# Altium PCB LSS-P-PCB-T v3.5.PcbDoc (part 1 of 5)
Units mil, origin at the board's own origin, x right, y up, seen from the top; angles counter-clockwise.
Board outline 2795.28 x 2795.28 mil, 4 copper layers (Top Layer, Power, Ground, Bottom Layer), stack 62.08 mil thick; 167 components, 123 nets, 589 pads, 650 vias.
Unrouted connection lines stored in the file: 2.
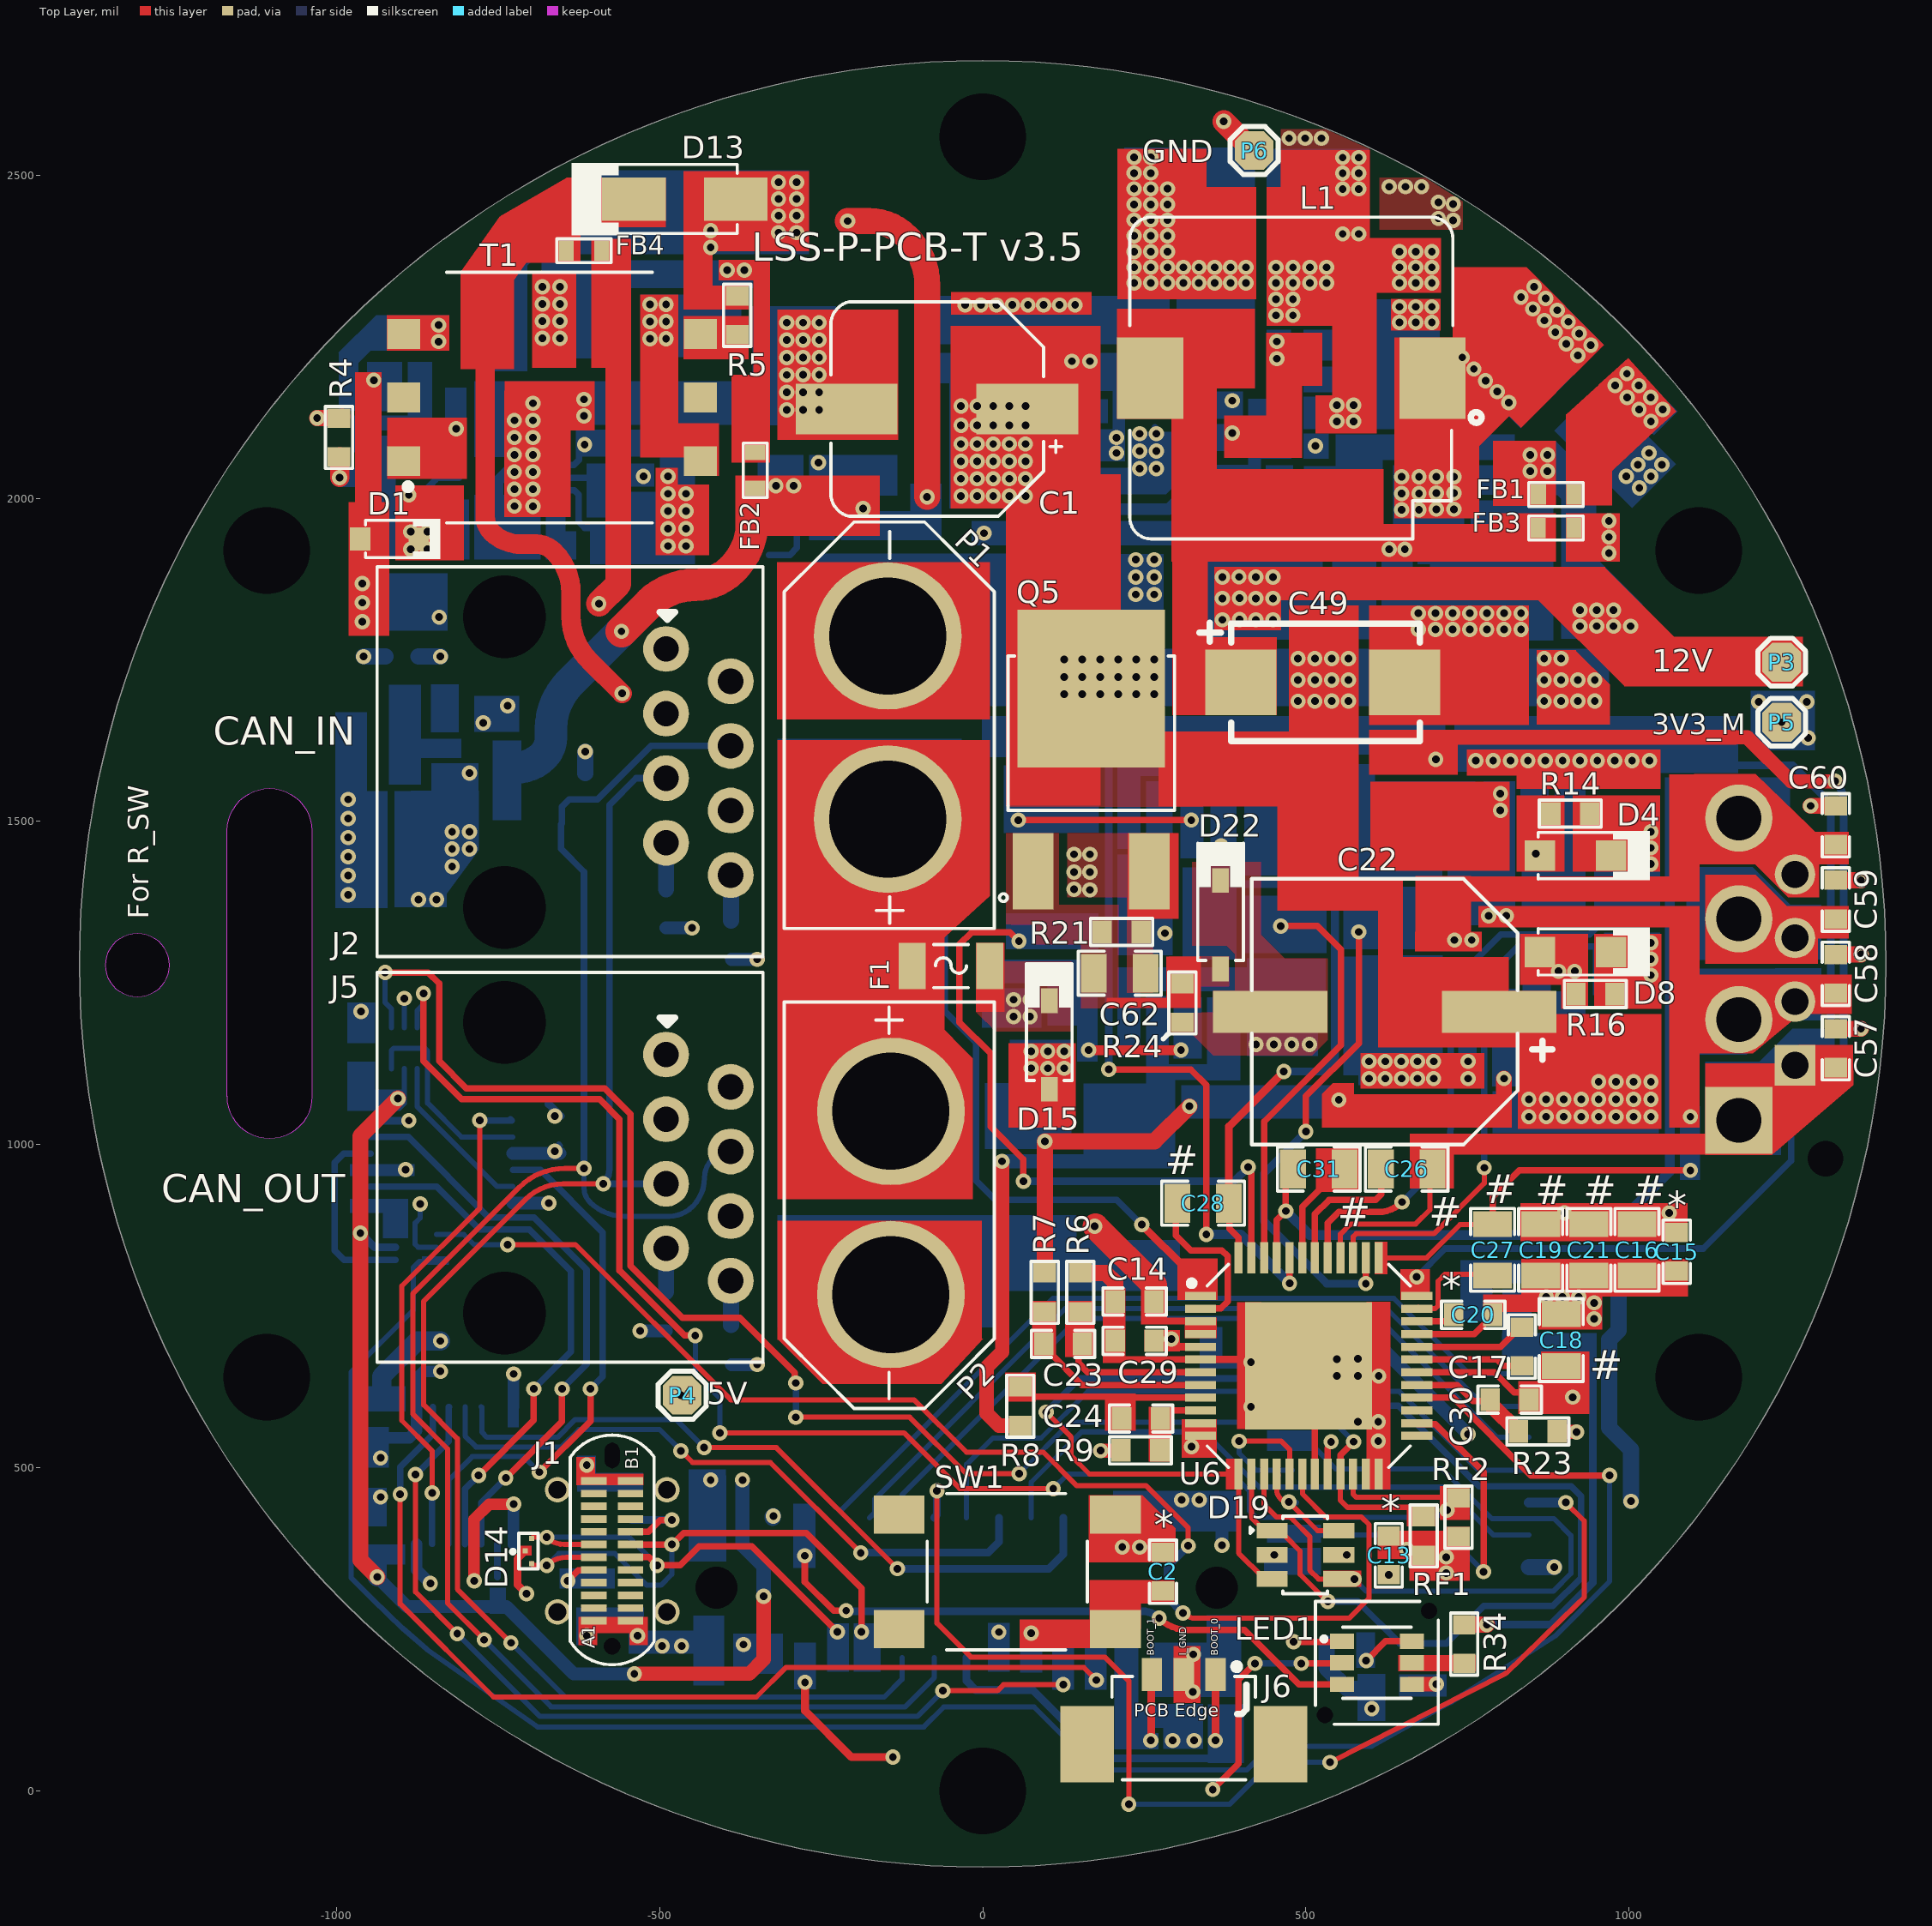
[diagram p0: Top Layer view]
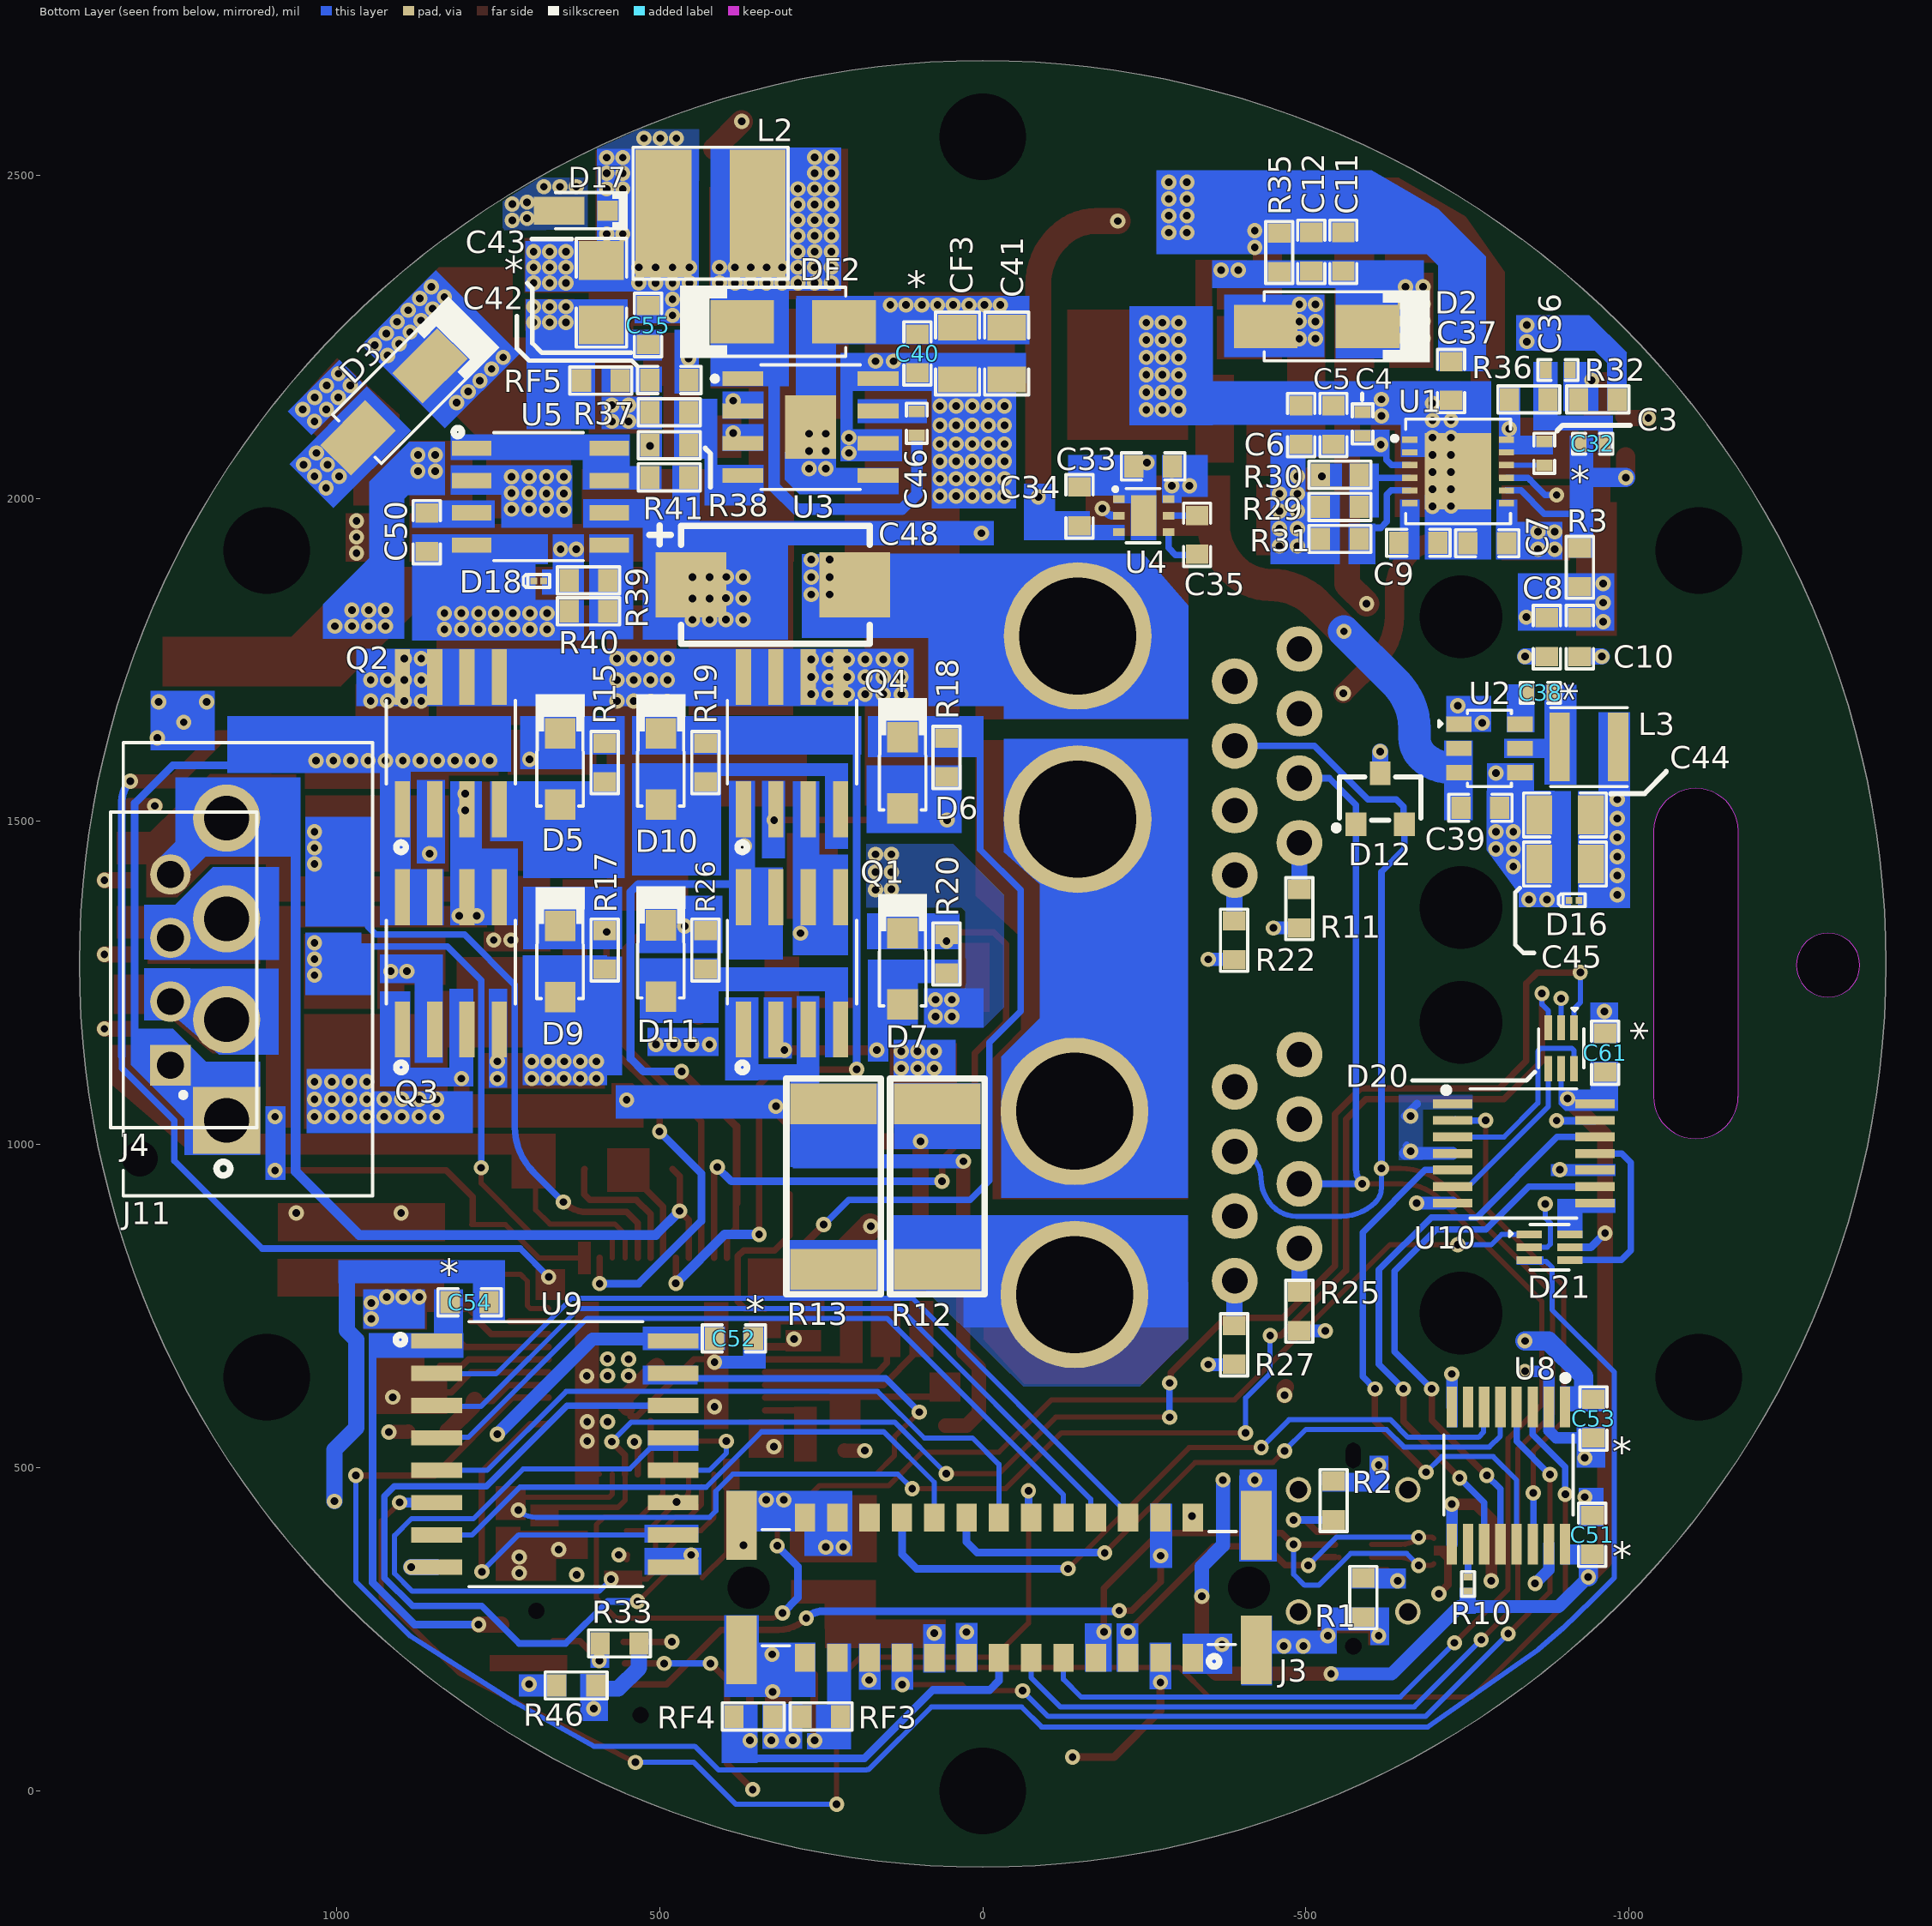
[diagram p1: Bottom Layer view, seen from below]
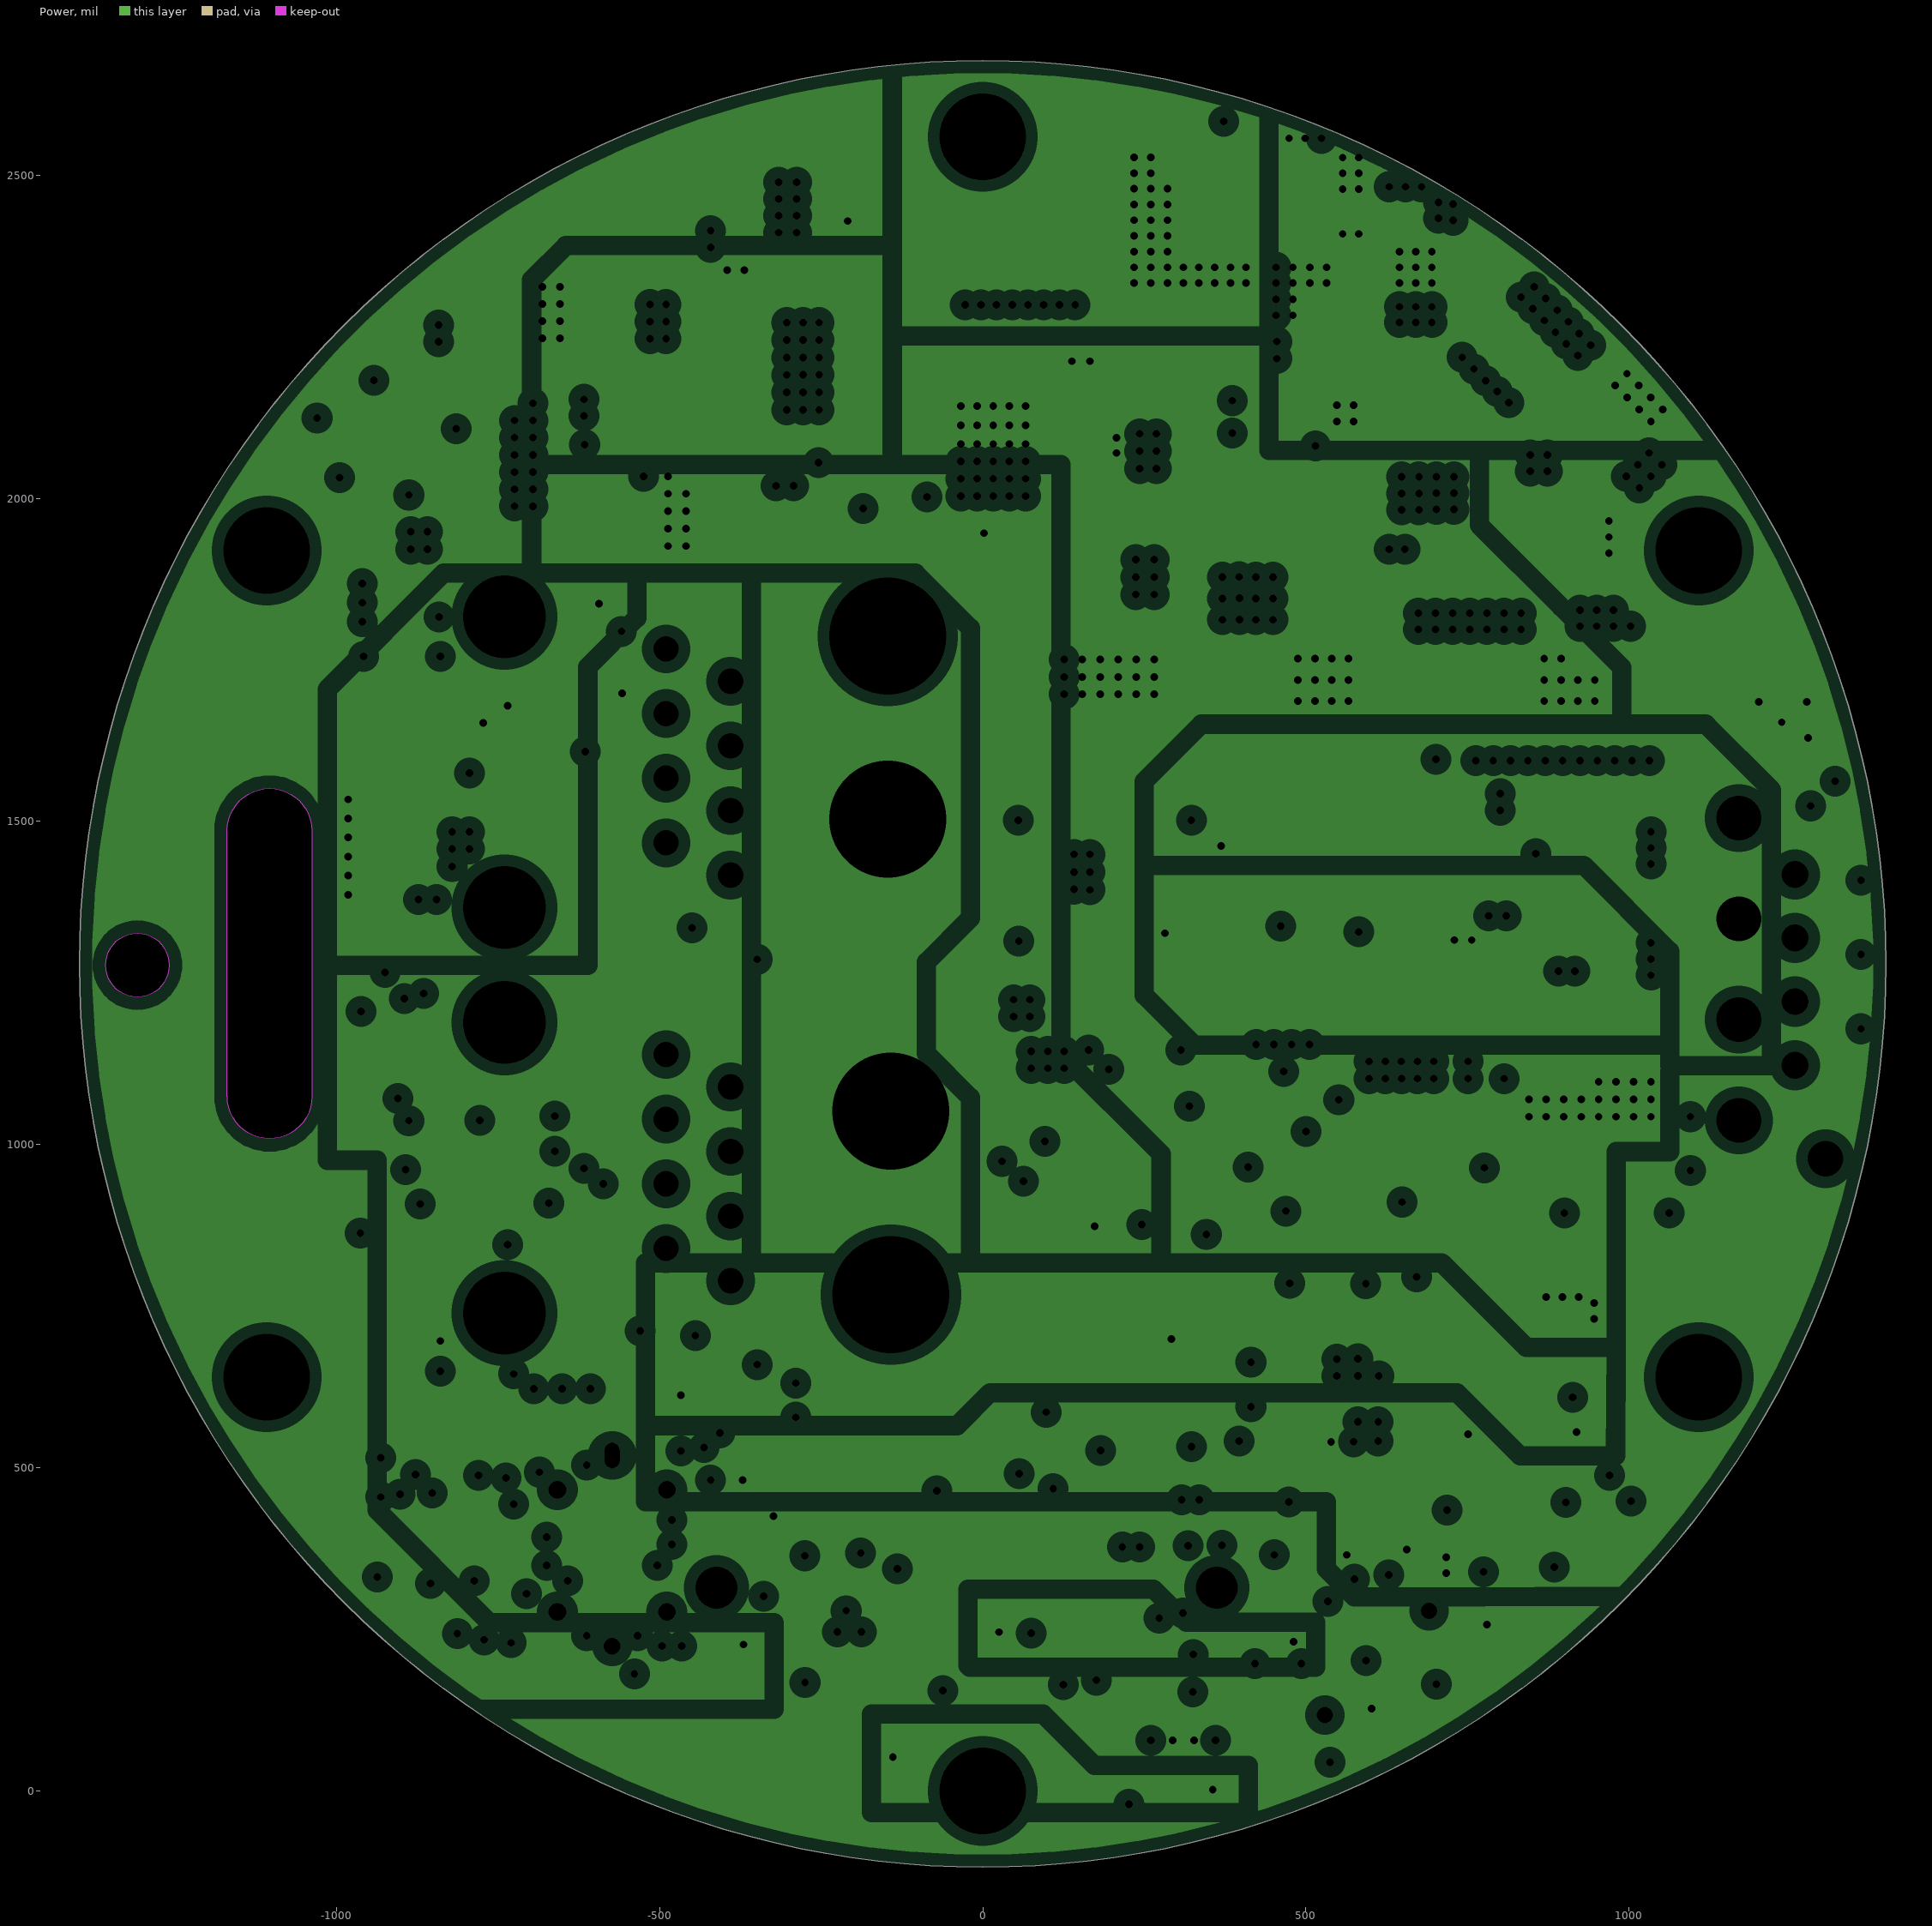
[diagram p2: Power, clearances drawn from the general rule]
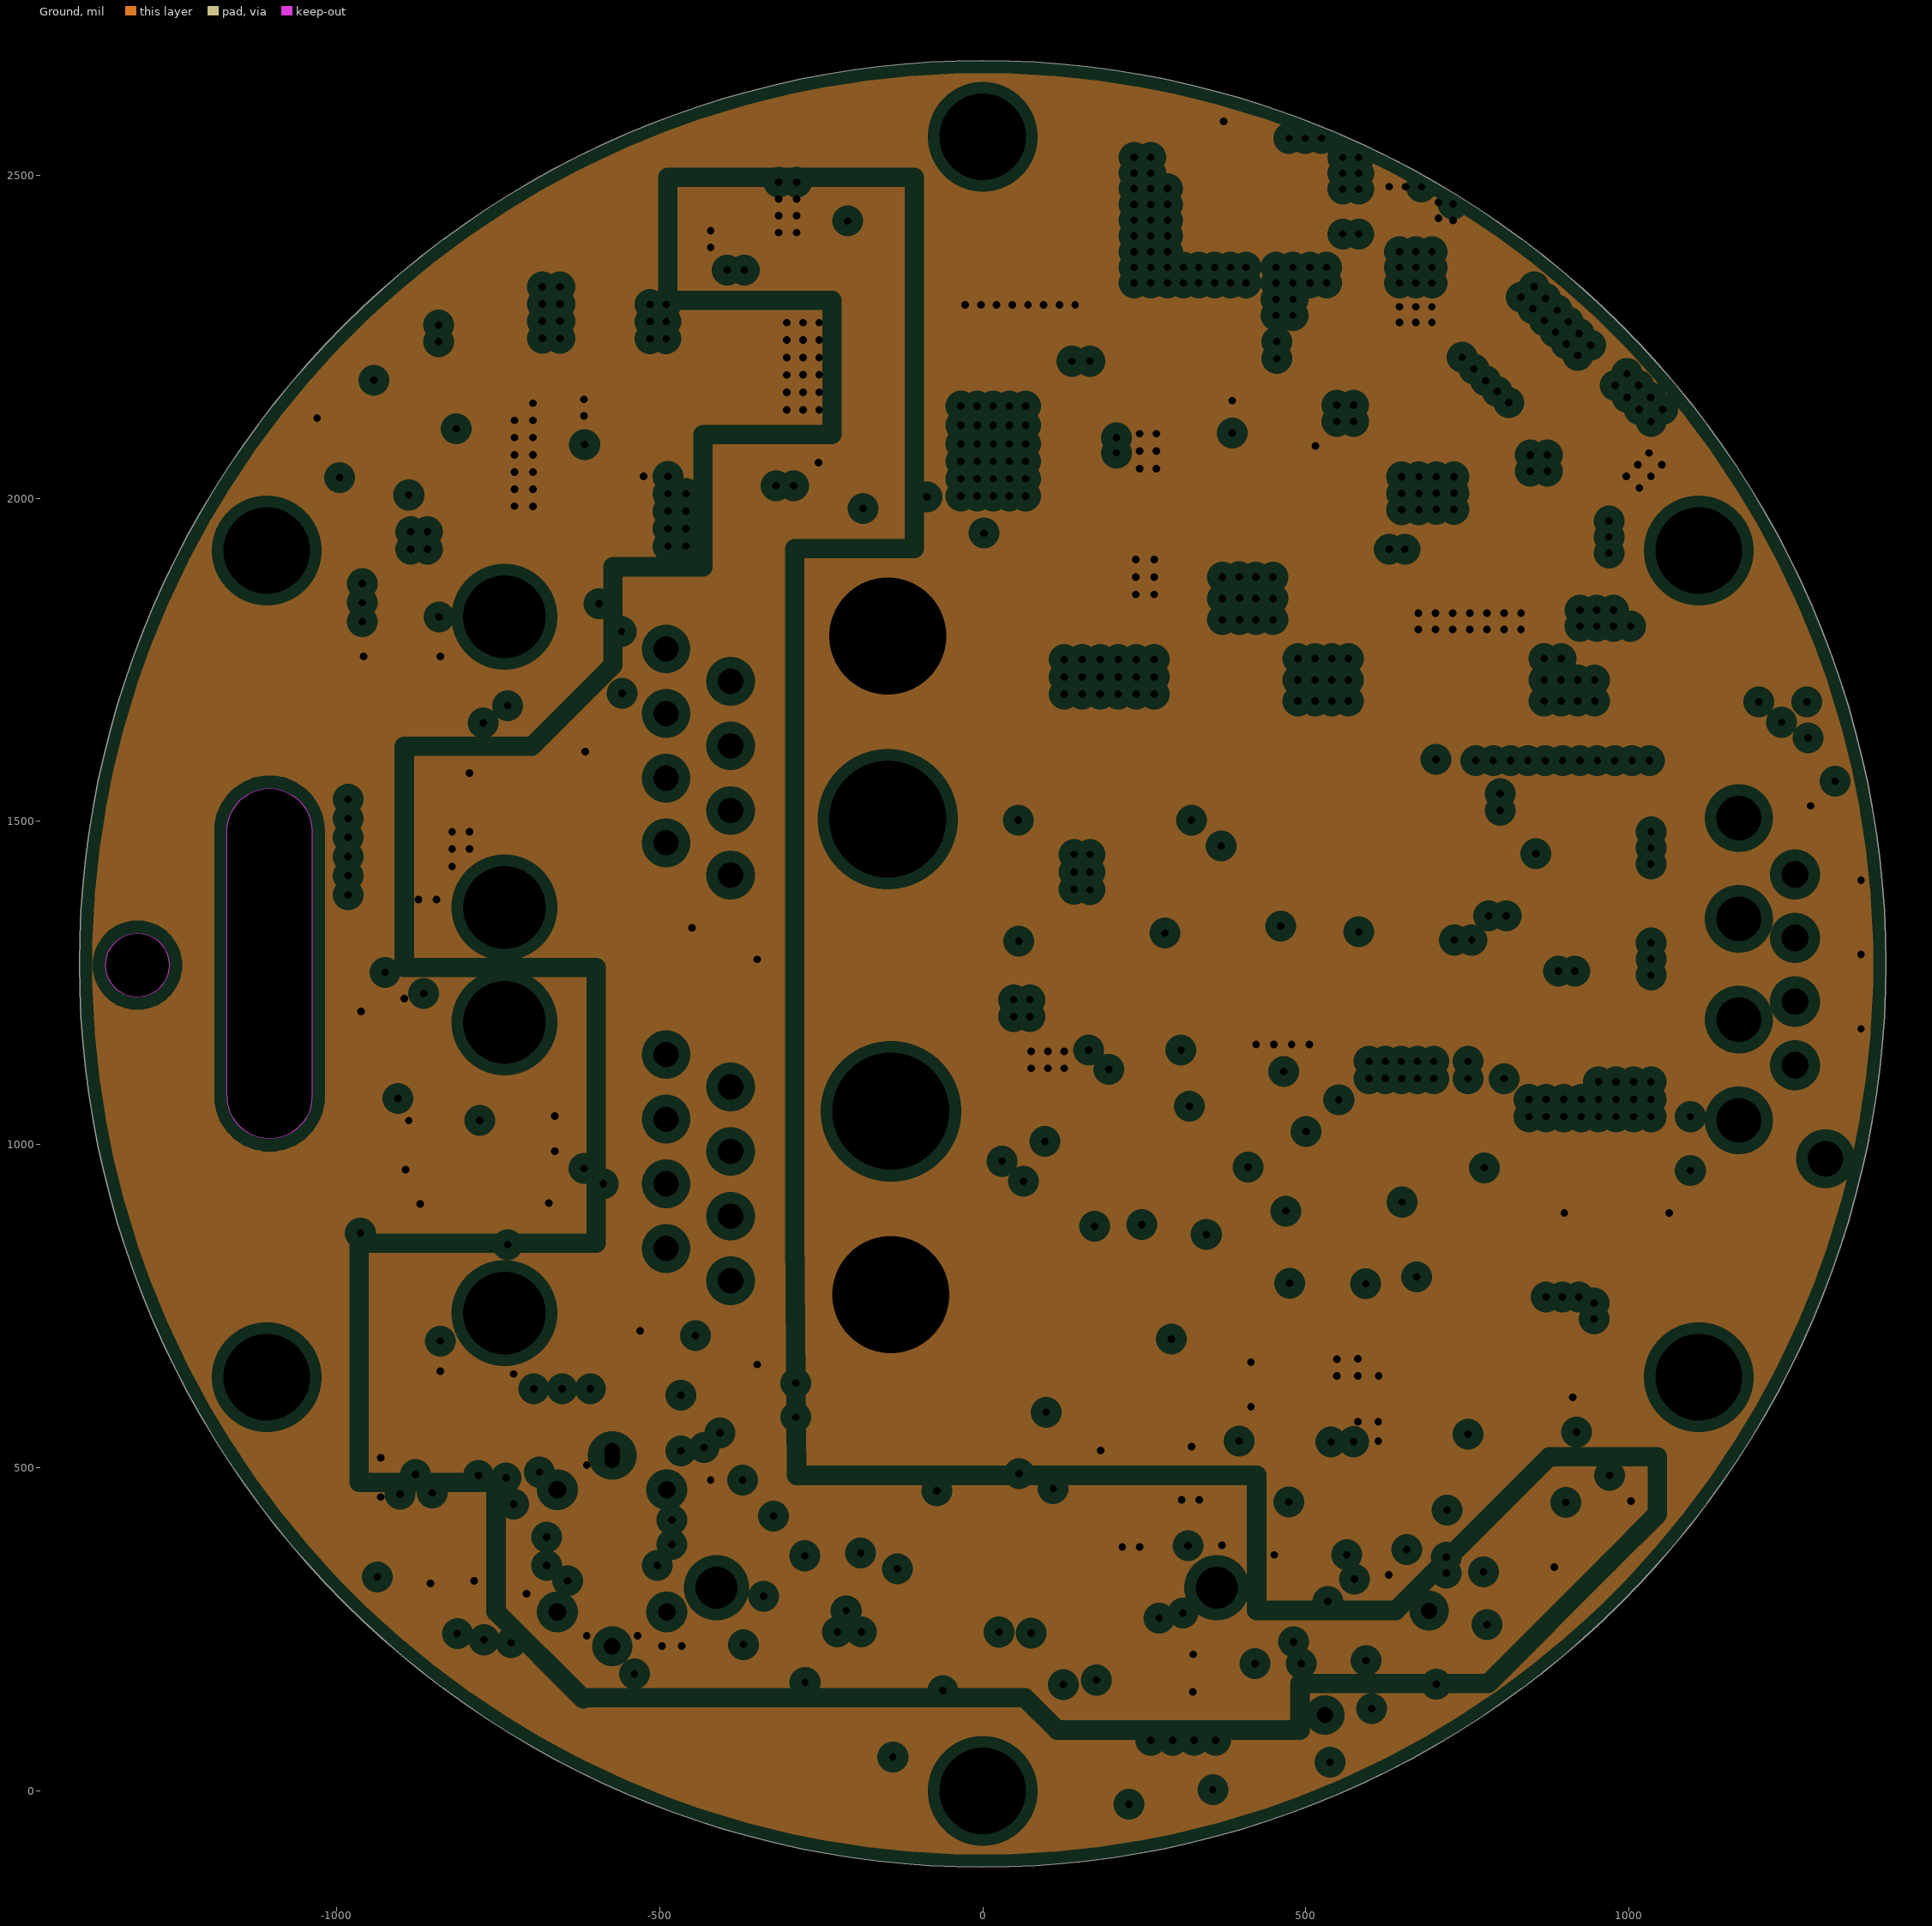
[diagram p3: Ground, clearances drawn from the general rule]
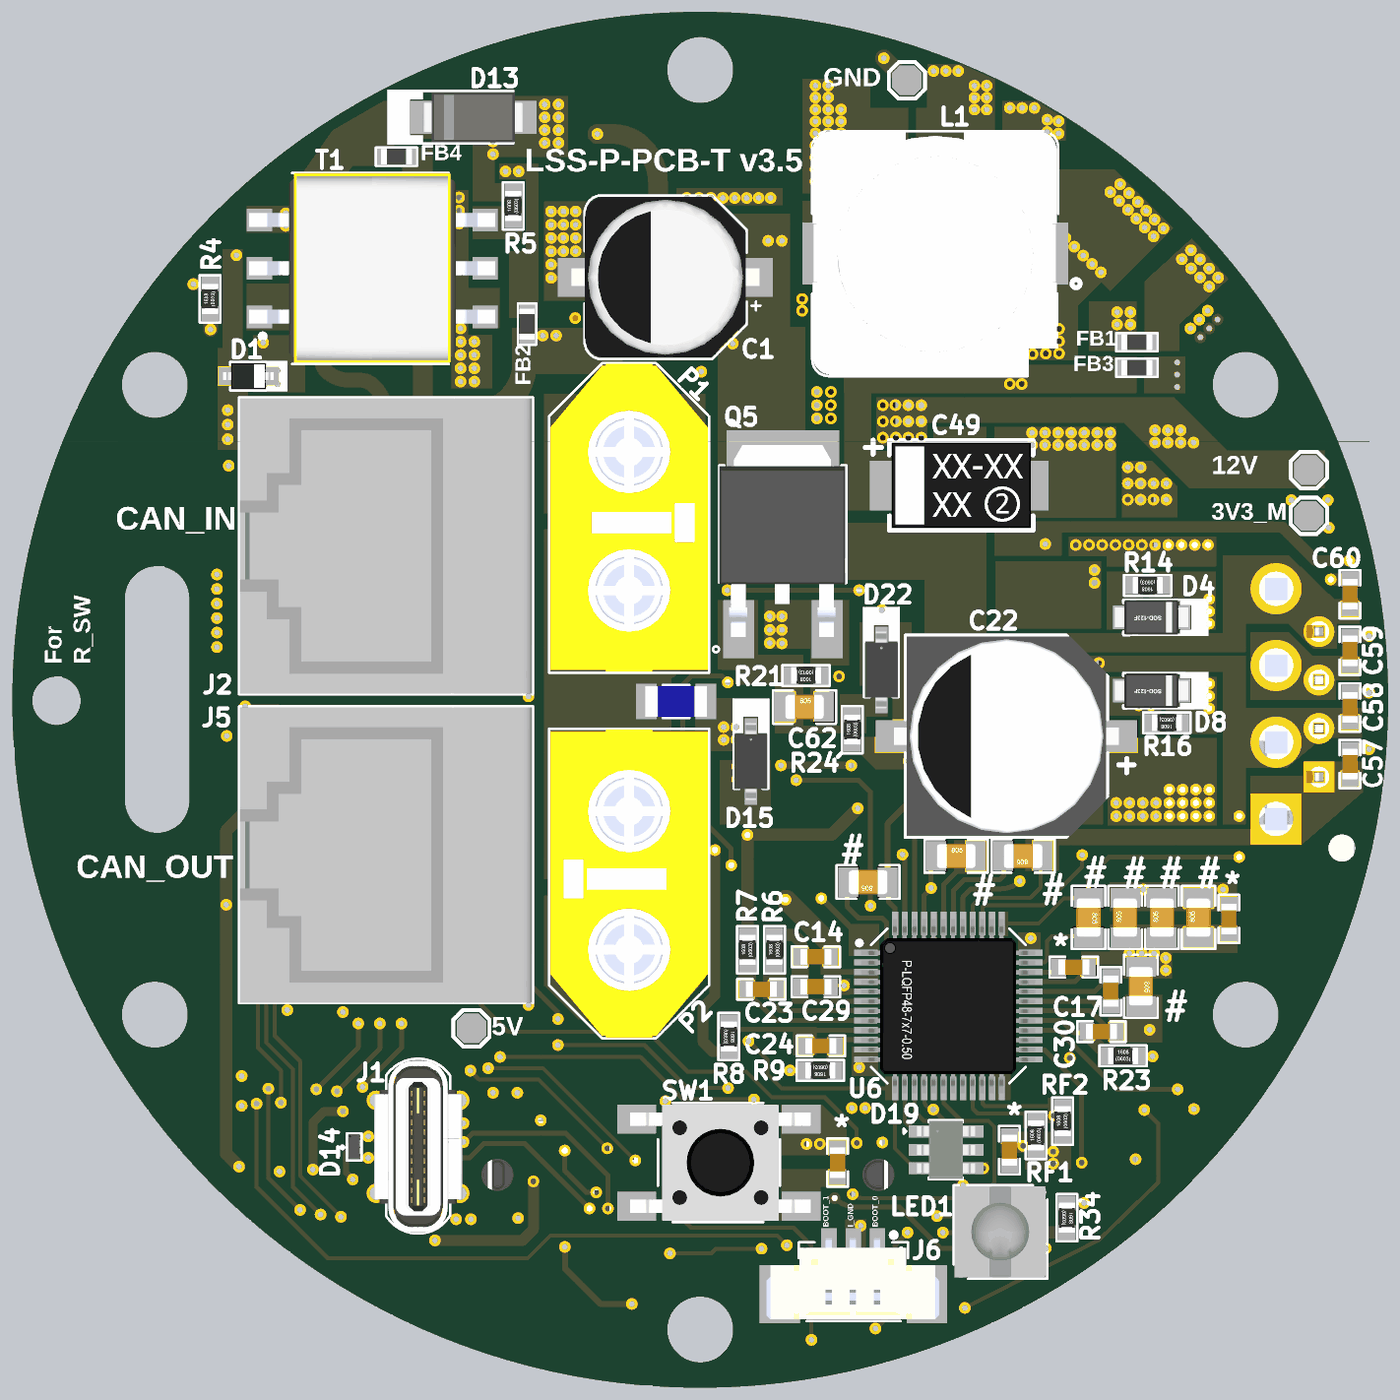
[diagram p6: 3D render of the assembled board from above, using the file's embedded part models]
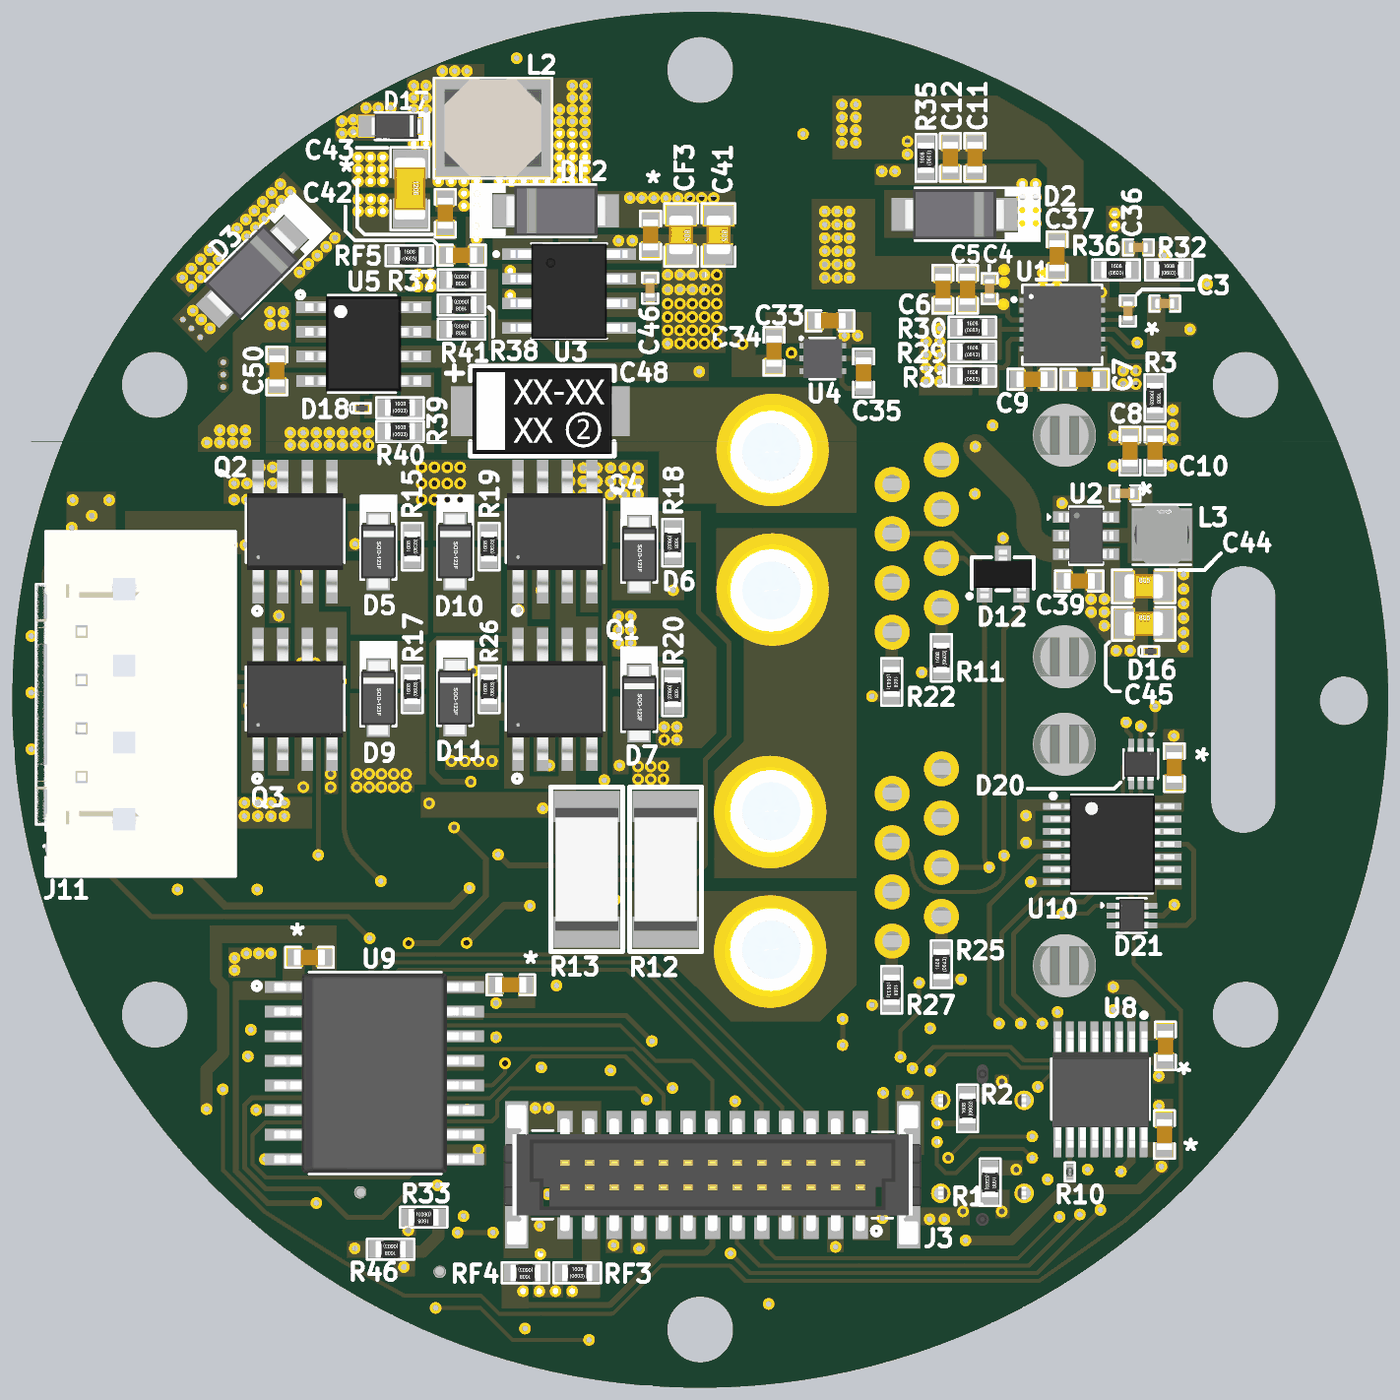
[diagram p7: 3D render of the assembled board from below, using the file's embedded part models]

## Layer stack, top to bottom
Top Solder: solder mask 0.5, Solder Resist, Dk 3.5
Top Layer: signal copper 1.7
Prepreg 1: prepreg 5, PP-015, Dk 4.3
Power: plane copper 1.7, net (Multiple Nets)
Core: core 45.28, FR-4, Dk 4.8
Ground: plane copper 1.7, net (Multiple Nets)
Prepreg 2: prepreg 5, PP-015, Dk 4.3
Bottom Layer: signal copper 1.7
Bottom Solder: solder mask 0.5, Solder Resist, Dk 3.5

## Board outline
-1397.64,1279.53 ccw(c0,1279.53) 0,-118.11 ccw(c0,1279.53) 1397.64,1279.53 ccw(c0,1279.53) 0,2677.17 ccw(c0,1279.53)
cut-out: -1308,1228.32 cw(c-1308,1277.53) -1357.21,1277.53 cw(c-1308,1277.53) -1308,1326.74 cw(c-1308,1277.53) -1258.79,1277.53 cw(c-1308,1277.53)
cut-out: -1169,1074.52 -1169,1485.52 -1169.09,1485.52 cw(c-1103.59,1485.52) -1038.09,1485.53 -1038,1485.53 -1038,1074.52 -1037.93,1074.52 cw(c-1103.43,1074.52)

## Design rules (kind name [scope] priority, off if disabled: settings)
Clearance [All] p1: gap=7 ignorepadtopadclearanceinfootprint=FALSE except(0: Arc-Hole Track-Hole SMDPad-Hole THPad-Hole Via-Hole Fill-Hole Poly-Hole Region-Hole Text-Hole; 5: Arc-SMDPad Track-SMDPad SMDPad-SMDPad)
ComponentClearance [All] p1: gap=7 collisioncheckmode=3 verticalgap=7 showdistances=FALSE
HoleSize [All] p1: absolutevalues=TRUE maxlimit=1000 minlimit=1 maxpercent=80.000 minpercent=20.000
HoleToHoleClearance [All] p1: gap=0 allowstackedmicrovias=TRUE
MinimumSolderMaskSliver [All] p1: minsoldermaskwidth=0
PlaneClearance [All] p1: clearance=18
PlaneConnect [All] p1: planeconnectstyle=Direct reliefexpansion=20 reliefentries=4 reliefconductorwidth=10 reliefairgap=10
PolygonConnect [All] p1: connectstyle=Direct reliefconductorwidth=10 reliefentries=4 polygonreliefangle="90 Angle" airgapwidth=10
RoutingVias [All] p1: holewidth=11.81 width=23.62 viastyle="Through Hole" minholewidth=11.81 minwidth=23.62 maxholewidth=11.81 maxwidth=23.62
SilkToSilkClearance [All] p1: silktosilkclearance=0
SilkToSolderMaskClearance [IsPad] p1: minsilkscreentomaskgap=0 clearancetoexposedcopper=TRUE
SolderMaskExpansion SolderMaskExpansion_1 [Not IsVia] p1: expansion=4 istentingtop=FALSE
SolderMaskExpansion [IsVia] p2: expansion=0 istentingtop=FALSE soldermaskfromhole=TRUE
UnRoutedNet [All] p1: checkbadconnections=TRUE
Width [All] p1: maxlimit=100 minlimit=8 preferedwidth=22 minimp=50.000000 maximp=50.000000 favimp=50.000000
21 further rules are at their usual default settings.

## Classes and differential pairs
component class Signal-Isolation-Section: C51 C52 C53 C54 C61 D19 D20 D21 R10 U8 U9 U10
component class Motor-Supply-Section: C40 C41 C42 C43 C46 C48 C49 C50 C55 CF3 D3 D17 D18 DF2 FB1 FB3 L1 L2 R37 R38 R39 R40 R41 RF5 s U3 U5
component class Motor-Driver-Sheet: C13 C14 C15 C16 C17 C18 C19 C20 C21 C22 C23 C24 C26 C27 C28 C29 C30 C31 J4 J11 P3 P4 P5 P6 R6 R7 R8 R9 R12 R13 R23 RF1 RF2 U6
component class Isolated-Power-Section: 12 C3 C4 C5 C6 C7 C8 C9 C10 C11 C12 C32 C33 C34 C35 C36 C37 C38 C39 C44 C45 D1 D2 D13 D16 FB2 FB4 L3 R3 R4 R5 R29 R30 R31 R32 R35 R36 T1 U1 U2 U4
component class Driver-Sheet: C57 C58 C59 C60 D4 D5 D6 D7 D8 D9 D10 D11 Q1 Q2 Q3 Q4 R14 R15 R16 R17 R18 R19 R20 R26
component class Connector-Section: C1 C2 C62 D12 D14 D15 D22 F1 J1 J2 J3 J5 J6 LED1 P1 P2 Q5 R1 R2 R11 R21 R22 R24 R25 R27 R33 R34 R46 RF3 RF4 SSz SW1

## Components (designator, comment, footprint, x,y, rotation, side; value= is the part's Value field where it differs from the comment)
C1 "220uF" EEEFT1H221AP -70.76,2138 r180 top locked
C2 "0.1uF" "CAP 0603"#1 279,339 r270 top locked
C3 "10nF" "CAP 0402" -869,2069.5 r90 bottom locked
C4 "0.47uF" "CAP 0402" -587.71,2114.87 r90 bottom locked
C5 "2.2uF" "CAP 0603"#1 -542.71,2113.37 r90 bottom locked
C6 "2.2uF" "CAP 0603"#1 -492.71,2113.37 r90 bottom locked
C7 "1uF" "CAP 0603"#1 -780.71,1930.37 r0 bottom locked
C8 "10uF" "CAP 0603"#1 -873,1785 r270 bottom locked
C9 "82nF" "CAP 0603"#1 -674,1931 r0 bottom locked
C10 "10uF" "CAP 0603"#1 -924,1785 r270 bottom locked
C11 "10uF" "CAP 0603"#1 -558,2381.37 r90 bottom locked
C12 "10uF" "CAP 0603"#1 -508.36,2381.37 r90 bottom locked
C13 "0.1uF" "CAP 0603"#1 628.29,364.37 r270 top locked
C14 "2.2uF" "CAP 0603"#1 235,757 r180 top locked
C15 "0.1uF" "CAP 0603"#1 1074,834 r90 top locked
C16 "220nF" CAP0805#1 1012.28,837 r90 top locked
C17 "22nF" "CAP 0603"#2 834.29,687.37 r90 top locked
C18 "220nF" CAP0805#2 895.29,697.37 r270 top locked
C19 "220nF" CAP0805#2 863.43,837 r90 top locked
C20 "0.1uF" "CAP 0603"#1 758.96,736.27 r0 top locked
C21 "220nF" CAP0805#2 937.86,837 r90 top locked
C22 "220uF" 189RV0038 622.13,1205.37 r180 top locked
C23 "2.2nF" Cap-0603 124.29,691.37 r0 top locked
C24 "2.2nF" Cap-0603 245,576 r0 top locked
C26 "220nF" CAP0805#1 656,962 r180 top locked
C27 "220nF" CAP0805#1 789,837 r270 top locked
C28 "220nF" CAP0805#1 341,909.03 r180 top locked
C29 "2.2uF" "CAP 0603"#2 235,696.3 r180 top locked
C30 "0.47uF" "CAP 0603"#1 815.29,605.37 r0 top locked
C31 "220nF" CAP0805#1 520,962 r0 top locked
C32 "0.1UF" "CAP 0402" -943.71,2084.37 r0 bottom locked
C33 "4.7UF" "CAP 0603"#1 -263.71,2049.37 r0 bottom locked
C34 "2.2uF" "CAP 0603"#1 -149.71,1987.37 r90 bottom locked
C35 "2.2uF" "CAP 0603"#1 -331.71,1943.37 r270 bottom locked
C36 "1000pF" "CAP 0402" -890.21,2198.37 r180 bottom locked
C37 "2.2nF" "CAP 0603"#1 -724.71,2181.37 r90 bottom locked
C38 "0.1uf" Cap-0402 -863,1699 r0 bottom locked
C39 "10uF" Cap-0603 -770,1521 r0 bottom locked
C40 "0.1uF" "CAP 0603"#1 101,2224 r90 bottom locked
C41 "10uF" Cap0805 -37,2224 r270 bottom locked
C42 "6.8nF" "CAP 0603"#1 485,2183 r0 bottom locked
C43 "47uF" CAP1206 590,2318 r270 bottom locked
C44 "22uF" Cap-0805 -901,1510 r180 bottom locked
C45 "22uF" Cap-0805 -901,1434 r180 bottom locked
C46 "10nF" "CAP 0402" 102,2116 r270 bottom locked
C48 "100uF" "CAP- 2917" 451.54,1866 r180 bottom locked
C49 "100uF" "CAP- 2917" 399.45,1715.01 r0 top locked
C50 "470pF" "CAP 0603"#1 860.29,1947.37 r90 bottom locked
C51 "0.1uF" "CAP 0603"#1 -943,396 r90 bottom locked
C52 "0.1uF" "CAP 0603"#1 385,700 r180 bottom locked
C53 "0.1uF" "CAP 0603"#1 -945,576 r270 bottom locked
C54 "0.1uF" "CAP 0603"#1 794,756 r180 bottom locked
C55 "0.1uF" "CAP 0603"#1 518,2268 r270 bottom locked
C57 "1nF" "CAP 0603"#1 1320,1149 r90 top locked
C58 "1nF" "CAP 0603"#1 1320,1264 r90 top locked
C59 "1nF" "CAP 0603"#1 1320,1379 r90 top locked
C60 "1nF" "CAP 0603"#1 1320,1494 r90 top locked
C61 "0.1uF" "CAP 0603"#1 -963,1142 r90 bottom locked
C62 "10uF" Cap0805 212,1265 r0 top locked
CF3 "10uF" Cap0805 39,2224 r270 bottom locked
D1 "CUS10S30,H3F" CUS10S30,H3F -918,1937 r180 top locked
D2 "SSL110A" SMA -516.74,2266 r0 bottom locked
D3 "SS24A" SMA 911,2149 r315 bottom locked
D4 "CRS01(TE85L,Q,M)" CRS01(TE85L,Q,M) 917.02,1447 r180 top locked
D5 "CRS01(TE85L,Q,M)" CRS01(TE85L,Q,M) 654,1580.98 r270 bottom locked
D6 "CRS01(TE85L,Q,M)" CRS01(TE85L,Q,M) 124,1575.01 r270 bottom locked
D7 "CRS01(TE85L,Q,M)" CRS01(TE85L,Q,M) 124.03,1272 r270 bottom locked
D8 "CRS01(TE85L,Q,M)" CRS01(TE85L,Q,M) 917.02,1298 r180 top locked
D9 "CRS01(TE85L,Q,M)" CRS01(TE85L,Q,M) 653.98,1283 r270 bottom locked
D10 "CRS01(TE85L,Q,M)" CRS01(TE85L,Q,M) 498,1581 r270 bottom locked
D11 "CRS01(TE85L,Q,M)" CRS01(TE85L,Q,M) 498,1284.12 r270 bottom locked
D12 "PESD2CAN,215" SOT-23 -615,1535 r180 bottom locked
D13 "1SMA5913BT3G-MS" SMA -461,2463 r0 top locked
D14 "ESD122DMYR" X2-SON-3(0.6x1.3) -703,371 r0 top locked
D15 "AZ4036-01G" SOD-123 103,1154 r270 top locked
D16 "ESDM2033MX4T5G" "2-DFN (0.6x0.3)" -915,1378 r180 bottom locked
D17 "MSMP12A-M3/89A" MicroSMP 618,2445 r180 bottom locked
D18 "ESDM2033MX4T5G" "2-DFN (0.6x0.3)" 687,1872 r180 bottom locked
D19 "USBLC6-4SC6" SOT-23-6 499.53,365 r0 top locked value=4pF
D20 "USBLC6-2P6" SOT-666 -895,1149 r270 bottom locked value=3.5pF
D21 "USBLC6-2P6" SOT-666 -877,841 r180 bottom locked value=3.5pF
D22 "BZT52C16" SOD-123 368,1340 r270 top locked
DF2 "SS24A" SMA 293.26,2273 r180 bottom locked
F1 "0685P9100-01" "Fuse 1206 (3216 Metric)" -49,1276 r180 top locked
FB1 "MPZ1608S121ATDH5" MPZ1608S121ATDH5 887.26,2006 r180 top locked
FB2 "MPZ1608S121ATDH5" MPZ1608S121ATDH5 -352,2043 r270 top locked
FB3 "MPZ1608S121ATDH5" MPZ1608S121ATDH5 887,1954 r0 top locked
FB4 "MPZ1608S121ATDH5" MPZ1608S121ATDH5 -617,2383 r180 top locked
J1 "MC-318FB" MC-318FB -573.34,371.27 r90 top locked
J2 "0855115001" 0855115001 -565,1591.8 r270 top locked
J3 "M55-7012642R" M55-7012642R -25,314.26 r180 bottom locked
J4 "B4B-XH-A(LF)(SN)" B4B-XH-A(LF)(SN) 1257,1122.72 r90 bottom locked
J5 "0855115001" 0855115001 -565,964.19 r270 top locked
J6 "0533980367" 0533980367 311,126 r180 top locked
J11 "B4P-VH-FB-B(LF)(SN)" B4P-VH-FB-B(LF)(SN) 1236.93,1241.65 r90 bottom locked
L1 "220uH" SLF12575T-221M1R3-PF 477.5,2186 r180 top locked
L2 "33uH" PNLS5020-330 421.17,2441 r180 bottom locked
L3 "3.9uH" FNR3015S3R9MT -938,1615 r180 bottom locked
LED1 "LTST-G683GEBW" LTST-G683GEBW 610,198 r0 top locked
P1 "2158" 2158 -147,1645.2 r270 top locked
P2 "2158" 2158 -142,909.62 r90 top locked
P3 "Test Point" "TEST POINT" 1236.29,1746.37 r180 top locked
P4 "Test Point" "TEST POINT" -465,612 r270 top locked
P5 "Test Point" "TEST POINT" 1236.29,1653.37 r0 top locked
P6 "Test Point" "TEST POINT" 420,2538 r90 top locked
Q1 "AO4882-MS" AO4882-MS 295,1280.36 r90 bottom locked
Q2 "AO4882-MS" AO4882-MS 823,1621 r90 bottom locked
Q3 "AO4882-MS" AO4882-MS 823,1280.36 r90 bottom locked
Q4 "AO4882-MS" AO4882-MS 295,1621 r90 bottom locked
Q5 "SQD19P06-60L_GE3" DPAK 168,1564 r0 top locked
R1 "5.1K" RES0603 -589,299 r90 bottom locked
R2 "5.1K" RES0603 -543,449 r270 bottom locked
R3 "3.9K" RES0603 -924,1893 r90 bottom locked
R4 "7.87k" RES0603 -996,2094 r270 top locked
R5 "0R" RES0603 -380,2283 r270 top locked
R6 "47R" RES0603 150.96,771.27 r270 top locked
R7 "47R" RES0603 95.96,771.27 r270 top locked
R8 "47R" RES0603 58,595 r90 top locked
R9 "47R" RES0603 244,526.63 r0 top locked
R10 "4.7K" Res-0201 -751,320 r90 bottom locked
R11 "0R" Res0603 -490,1365 r270 bottom locked
R12 "50mR" RES-2512 70.28,935 r270 bottom locked
R13 "50mR" RES-2512 230.86,935 r270 bottom locked
R14 "22R" RES0603 909,1512 r0 top locked
R15 "22R" RES0603 585,1591 r270 bottom locked
R16 "22R" RES0603 948,1233 r0 top locked
R17 "22R" RES0603 585,1301 r270 bottom locked
R18 "22R" RES0603 56,1599 r90 bottom locked
R19 "22R" RES0603 429,1591 r270 bottom locked
R20 "22R" RES0603 56,1295 r90 bottom locked
R21 "24.9K" Res0603 215,1329 r0 top locked
R22 "0R" Res0603 -389,1316 r90 bottom locked
R23 "2R2" RES0603 859,556 r180 top locked
R24 "20K" Res0603 309,1219 r270 top locked value=20kR
R25 "0R" Res0603 -490,742 r270 bottom locked
R26 "22R" RES0603 429,1301 r270 bottom locked
R27 "0R" Res0603 -389,690 r90 bottom locked
R29 "127K" RES0603 -552.71,1986.69 r0 bottom locked
R30 "100K" RES0603 -552.71,2036.37 r0 bottom locked
R31 "100K" RES0603 -552.71,1937 r0 bottom locked
R32 "0R" RES0603 -951.71,2153 r0 bottom locked
R33 "51R" RES0603 562,228 r180 bottom locked
R34 "150R" RES0603 745,227 r90 top locked
R35 "2K" RES0603 -458.71,2380.37 r270 bottom locked
R36 "51.1K" RES0603 -845,2153 r0 bottom locked
R37 "110K" RES0603 485,2133 r180 bottom locked
R38 "10K" RES0603 485,2082 r180 bottom locked
R39 "2K" RES0603 610,1873 r0 bottom locked
R40 "1.2K" RES0603 610,1825 r0 bottom locked value=1.2kΩ
R41 "0.33R" RES0603 485,2032.37 r180 bottom locked value=0.33Ω
R46 "51R" RES0603 629,163 r180 bottom locked
RF1 "10K" RES0603 682.29,394.37 r270 top locked
RF2 "10K" RES0603 736.29,423.37 r270 top locked
RF3 "10K" RES0603 250,115 r0 bottom locked
RF4 "10K" RES0603 355,115 r180 bottom locked
RF5 "10K" RES0603 591,2182 r0 bottom locked
SW1 "Tactile Switch 13mm Actuator" "TACTILE SWITCH 13MM ACTUATOR" 38,339 r180 top locked
T1 "750314597" 750314597 -666.19,2155.8 r180 top locked
U1 "LM5160ADNTR" LM5160ADNTR -735.52,2041.53 r180 bottom locked
U2 "AP63203WU-7" TSOT-23-6 -784,1613 r180 bottom locked
U3 "BD9876AEFJ-E2" 8-HTSOP-J 266.53,2110 r180 bottom locked
U4 "TPS60150DRVR" TPS60150DRVR -249.1,1972.96 r180 bottom locked
U5 "MC34063ADR" SOIC-8 684.29,2002.37 r180 bottom locked
U6 "TMC5160A-TA-T" "48-TQFP-EP (7X7)" 504.29,657.37 r0 top locked
U8 "ISO7740FDBQR" 16-SSOP -901,594 r270 bottom locked
U9 "ISO6762FQDWRQ1" 16-SOIC 662,521 r180 bottom locked
U10 "SN74LVTH125PWR" SN74LVTH125PWR -837.17,986.15 r180 bottom locked

## Footprints (in the part's own frame and the unit in brackets; to place one, negate y for a bottom-side part, rotate by r counter-clockwise, add the part's x,y. Pads: shape width x height; smd on the part's side, far side on the other; paste and mask are expansions set on the pad)
"2-DFN (0.6x0.3)" [mm]
  rect 0.26x0.27 smd mask+0.055: 1(-0.195,0) 2(0.195,0)
  silkscreen extent -0.61,-0.25 0.43,0.25, body extent -0.3,-0.15 0.3,0.15, height 0.3
8-HTSOP-J [mm]
  rect 1.61x0.58 smd: 1(-2.655,1.905) 2(-2.655,0.635) 3(-2.655,-0.635) 4(-2.655,-1.905) 5(2.655,-1.905) 6(2.655,-0.635) 7(2.655,0.635) 8(2.655,1.905)
  rect 2x2.5 smd paste-2: 9(0,0)
  silkscreen extent -3.86,-2.45 1.95,2.45, body extent -3.01,-2.45 3.01,2.45, height 1.08
16-SOIC [mm]
  rect 2x0.6 smd: 1(-4.65,4.445) 2(-4.65,3.175) 3(-4.65,1.905) 4(-4.65,0.635) 5(-4.65,-0.635) 6(-4.65,-1.905) 7(-4.65,-3.175) 8(-4.65,-4.445) 9(4.65,-4.445) 10(4.65,-3.175) 11(4.65,-1.905) 12(4.65,-0.635) 13(4.65,0.635) 14(4.65,1.905) 15(4.65,3.175) 16(4.65,4.445)
  silkscreen extent -6.25,-5.21 3.45,5.21, body extent -5.17,-5.15 5.17,5.15, height 2.59
16-SSOP [mm]
  rect 1.6x0.41 smd: 1(0,0) 2(0,-0.635) 3(0,-1.27) 4(0,-1.905) 5(0,-2.54) 6(0,-3.175) 7(0,-3.81) 8(0,-4.445) 9(5.4,-4.445) 10(5.4,-3.81) 11(5.4,-3.175) 12(5.4,-2.54) 13(5.4,-1.905) 14(5.4,-1.27) 15(5.4,-0.635) 16(5.4,0)
  silkscreen extent -1.25,-4.76 4.25,0.32, body extent -0.3,-4.71 5.7,0.27, height 1.1
"48-TQFP-EP (7X7)" [mm]
  rect 1.22x0.32 smd: 1(-4.25,2.75) 2(-4.25,2.25) 3(-4.25,1.75) 4(-4.25,1.25) 5(-4.25,0.75) 6(-4.25,0.25) 7(-4.25,-0.25) 8(-4.25,-0.75) 9(-4.25,-1.25) 10(-4.25,-1.75) 11(-4.25,-2.25) 12(-4.25,-2.75) 25(4.25,-2.75) 26(4.25,-2.25) 27(4.25,-1.75) 28(4.25,-1.25) 29(4.25,-0.75) 30(4.25,-0.25) 31(4.25,0.25) 32(4.25,0.75) 33(4.25,1.25) 34(4.25,1.75) 35(4.25,2.25) 36(4.25,2.75)
  rect 0.32x1.22 smd: 13(-2.75,-4.25) 14(-2.25,-4.25) 15(-1.75,-4.25) 16(-1.25,-4.25) 17(-0.75,-4.25) 18(-0.25,-4.25) 19(0.25,-4.25) 20(0.75,-4.25) 21(1.25,-4.25) 22(1.75,-4.25) 23(2.25,-4.25) 24(2.75,-4.25) 37(2.75,4.25) 38(2.25,4.25) 39(1.75,4.25) 40(1.25,4.25) 41(0.75,4.25) 42(0.25,4.25) 43(-0.25,4.25) 44(-0.75,4.25) 45(-1.25,4.25) 46(-1.75,4.25) 47(-2.25,4.25) 48(-2.75,4.25)
  rect 5x5 smd: 49(0,0)
  silkscreen extent -4.7,-3.99 3.99,3.99, body extent -4.51,-4.51 4.49,4.49, height 1.43
189RV0038 [mm]
  rect 4.5x1.65 smd paste+0 mask+0.051: 1(-4.5,0) 2(4.5,0)
  silkscreen extent -6.58,-5.23 5.23,5.23, body extent -5.8,-5.15 5.8,5.15, height 11.81
2158 [mm]
  round 5.8 hole 4.6: 1(-3.6,0) 2(3.6,0)
  silkscreen extent -8.08,-4.06 7.9,4.19, body extent -8.05,-4.01 7.85,4.14, height 16.3
0533980367 [mm]
  rect 0.8x1.3 smd: 1(-1.25,-1.375) 2(0,-1.375) 3(1.25,-1.375)
  rect 2.1x3 smd: MP1(-3.8,1.375) MP2(3.8,1.375)
  silkscreen extent -2.82,-1.8 2.82,2.77, body extent -4.42,-1.52 4.48,2.68, height 4.7
750314597 [mm]
  rect 1.3x1.17 smd: 1(5.83,2.5) 2(5.83,0) 3(5.83,-2.5) 4(-5.83,-2.5) 5(-5.83,0) 6(-5.83,2.5)
  silkscreen extent -3.94,-4.93 5.79,4.93, body extent -6.35,-4.9 6.35,4.88, height 8.59
0855115001 [mm]
  round 1.8 hole 1: 1(-4.445,1.905) 2(-3.175,4.445) 3(-1.905,1.905) 4(-0.635,4.445) 5(0.635,1.905) 6(1.905,4.445) 7(3.175,1.905) 8(4.445,4.445)
  round 0 hole 3.25 unplated: MH1(-5.715,-4.445) MH2(5.715,-4.445)
  silkscreen extent -7.67,-9.45 7.65,5.72, body extent -7.62,-9.41 7.62,5.68, height 15.75
AO4882-MS [mm]
  rect 2.2x0.6 smd: 1(-2.6,1.905) 2(-2.6,0.635) 3(-2.6,-0.635) 4(-2.6,-1.905) 5(2.6,-1.905) 6(2.6,-0.635) 7(2.6,0.635) 8(2.6,1.905)
  silkscreen extent -4.28,-2.54 1.68,2.54, body extent -3.13,-2.47 3.13,2.47, height 1.75
B4B-XH-A(LF)(SN) [mm]
  rect 1.59x1.59 hole 1.06: 1(0,0)
  round 1.59 hole 1.06: 2(2.5,0) 3(5,0) 4(7.5,0)
  silkscreen extent -2.45,-3.4 9.95,2.35, body extent -2.45,-3.4 9.95,2.35, height 7
B4P-VH-FB-B(LF)(SN) [mm] "CONN HEADER VERT 4POS 3.96MM"
  rect 2.64x2.64 hole 1.76: 1(-5.19,-1.7)
  round 2.64 hole 1.76: 2(-1.23,-1.7) 3(2.73,-1.7) 4(6.69,-1.7)
  round 0 hole 1.397 unplated: 20(-6.69,1.7)
  silkscreen extent -8.15,-7.44 9.65,2.36, body extent -8.12,-7.39 9.6,2.31, height 11
CAP0805#1 [mil] "SMD 0805"
  rect 40x60 smd mask+2.76: 1(-40,0) 2(40,0)
  silkscreen extent -64,-34 64,34, body extent -39,-25 39,25, height 30
CAP0805#2 [mil] "SMD 0805"
  rect 40x60 smd: 1(-40,0) 2(40,0)
  silkscreen extent -64,-34 64,34, body extent -39,-25 39,25, height 30
Cap0805 [mil] "SMD 0805"
  rect 40x60 smd mask+2.76: 1(-40,0) 2(40,0)
  silkscreen extent -64,-34 64,34, body extent -39,-25 39,25, height 30
CAP1206 [mil] "SMD 1206"
  rect 60x70 smd: 1(-50,0) 2(50,0)
  silkscreen extent -84,-39 84,39, body extent -63,-31 63,32, height 39
"CAP 0402" [mil]
  rect 18x25 smd mask+2.36: 1(-18.5,0) 2(18.5,0)
  silkscreen extent -31,-16 31,16, body extent -20,-10 20,10, height 19
"CAP 0603"#1 [mil]
  rect 30x35 smd mask+2.36: 1(-30,0) 2(30,0)
  silkscreen extent -49,-21 49,21, body extent -32,-16 31,16, height 34
"CAP 0603"#2 [mil]
  rect 30x35 smd: 1(-30,0) 2(30,0)
  silkscreen extent -49,-21 49,21, body extent -32,-16 31,16, height 34
Cap-0402 [mil]
  rect 18x25 smd mask+2.36: 1(-18.5,0) 2(18.5,0)
  silkscreen extent -31,-16 31,16, body extent -20,-10 20,10, height 19
Cap-0603 [mil]
  rect 30x35 smd mask+2.36: 1(-30,0) 2(30,0)
  silkscreen extent -49,-21 49,21, body extent -32,-16 31,16, height 34
Cap-0805 [mil] "SMD 0805"
  rect 40x60 smd mask+2.76: 1(-40,0) 2(40,0)
  silkscreen extent -64,-34 64,34, body extent -39,-25 39,25, height 30
"CAP- 2917" [mm]
  rect 2.79x2.57 smd: 1(0,0) 2(6.44,0)
  silkscreen extent -1.63,-2.31 7.03,2.34, body extent -0.27,-2.21 6.92,2.21, height 2.88
CRS01(TE85L,Q,M) [mm] "DIODE SCHOTTKY 30V 1A SOD123F"
  rect 1.2x1.2 smd: 1(1.4,0) 2(-1.4,0)
  silkscreen extent -2.94,-0.97 1.46,0.97, body extent -1.9,-0.9 1.9,0.9, height 1.02
CUS10S30,H3F [mm]
  rect 0.8x0.9 smd mask+0.055: 1(-1.15,0) 2(1.15,0)
  silkscreen extent -2.01,-0.79 0.94,0.79, body extent -1.3,-0.67 1.3,0.67, height 1.1
DPAK [mm]
  rect 1.6x3 smd: 1(-2.285,-3.59) 3(2.285,-3.59)
  rect 5.8x6.2 smd: 2(0,3.59)
  silkscreen extent -3.61,-4.78 3.28,4.88, body extent -3.28,-3.99 3.22,5.92, height 2.51
EEEFT1H221AP [mm]
  rect 4x2 smd: 1(-3.55,0) 2(3.55,0)
  silkscreen extent -4.9,-4.22 4.17,4.22, body extent -4.85,-4.15 4.85,4.15, height 10.2
FNR3015S3R9MT [mm]
  rect 0.8x2.7 smd: 1(-1.15,0) 2(1.15,0)
  silkscreen extent -1.5,-1.55 1.5,1.55, body extent -1.5,-1.5 1.5,1.5, height 1.52
"Fuse 1206 (3216 Metric)" [mm] "0.126\" L x 0.062\" W x 0.026\" H (3.20mm x 1.58mm x 0.65mm)"
  rect 1.06x1.82 smd: 1(-1.528,0) 2(1.528,0)
  silkscreen extent -0.68,-0.85 0.68,0.85, body extent -1.6,-0.79 1.6,0.79, height 0.85
LM5160ADNTR [mm]
  rect 0.6x0.25 smd: 1(-1.9,1.25) 2(-1.9,0.75) 3(-1.9,0.25) 4(-1.9,-0.25) 5(-1.9,-0.75) 6(-1.9,-1.25) 7(1.9,-1.25) 8(1.9,-0.75) 9(1.9,-0.25) 10(1.9,0.25) 11(1.9,0.75) 12(1.9,1.25)
  rect 2.6x3 smd: 13(0,0)
  silkscreen extent -2.55,-2.06 2.06,2.06, body extent -2,-2 2,2, height 1
LTST-G683GEBW [mm]
  rect 0.95x0.6 smd: 1(-1.375,0.85) 2(-1.375,0) 3(-1.375,-0.85) 4(1.375,-0.85) 5(1.375,0) 6(1.375,0.85)
  round 0 hole 0.64 unplated: ""(-2.05,-2.05) ""(2.05,2.05)
  silkscreen extent -2.41,-2.41 2.41,2.41, body extent -2.36,-2.34 2.34,2.36, height 12.7
M55-7012642R [mm]
  rect 0.8x1.1 smd: A1(7.62,-2.75) A2(6.35,-2.75) A3(5.08,-2.75) A4(3.81,-2.75) A5(2.54,-2.75) A6(1.27,-2.75) A7(0,-2.75) A8(-1.27,-2.75) A9(-2.54,-2.75) A10(-3.81,-2.75) A11(-5.08,-2.75) A12(-6.35,-2.75) A13(-7.62,-2.75) B1(7.62,2.75) B2(6.35,2.75) B3(5.08,2.75) B4(3.81,2.75) B5(2.54,2.75) B6(1.27,2.75) B7(0,2.75) B8(-1.27,2.75) B9(-2.54,2.75) B10(-3.81,2.75) B11(-5.08,2.75) B12(-6.35,2.75) B13(-7.62,2.75)
  round 0 hole 1.65 unplated: MH1(-9.83,0) MH2(9.83,0)
  rect 1.2x2.7 smd: MP1(-10.115,-2.45) MP2(-10.115,2.45) MP3(10.115,-2.45) MP4(10.115,2.45)
  silkscreen extent -9.3,-3.1 9.32,2.29, body extent -10.79,-3.6 10.8,3.6, height 8.25
MC-318FB [mm]
  rect 0.3x1 smd: A1(-2.75,0.72) A2(-2.25,0.72) A3(-1.75,0.72) A4(-1.25,0.72) A5(-0.75,0.72) A6(-0.25,0.72) A7(0.25,0.72) A8(0.75,0.72) A9(1.25,0.72) A10(1.75,0.72) A11(2.25,0.72) A12(2.75,0.72) B1(2.75,-0.72) B2(2.25,-0.72) B3(1.75,-0.72) B4(1.25,-0.72) B5(0.75,-0.72) B6(0.25,-0.72) B7(-0.25,-0.72) B8(-0.75,-0.72) B9(-1.25,-0.72) B10(-1.75,-0.72) B11(-2.25,-0.72) B12(-2.75,-0.72)
  round 0 hole 0.66 unplated: MH1(-3.75,0)
  round 0 hole 0.58 slot 1 at 0 deg unplated: MH2(3.75,0)
  round 1 hole 0.7: MP1(-2.4,2.15) MP2(2.4,2.15) MP3(2.4,-2.15) MP4(-2.4,-2.15)
  silkscreen extent -4.48,-1.65 4.55,1.65, body extent -4.43,-2.28 4.44,2.28, height 10.49
MicroSMP [mm]
  rect 2x1.1 smd paste+0 mask+0.051: 1(-0.95,0)
  rect 0.8x0.8 smd paste+0 mask+0.051: 2(0.95,0)
  silkscreen extent -1.09,-0.76 1.75,0.76, body extent -1.25,-0.65 1.25,0.65, height 0.66
MPZ1608S121ATDH5 [mm] "FERRITE BEAD 120 OHM 0603 1LN"
  rect 0.6x0.8 smd: 1(-0.7,0) 2(0.7,0)
  silkscreen extent -1.07,-0.47 1.07,0.47, body extent -0.8,-0.4 0.8,0.4, height 0.78
PNLS5020-330 [mm]
  rect 2.2x5 smd mask+0.055: 1(-1.85,0) 2(1.85,0)
  silkscreen extent -3.05,-2.59 3.05,2.59, body extent -2.5,-2.5 2.5,2.5, height 2
RES0603 [mil]
  rect 30x35 smd: 1(-30,0) 2(30,0)
  silkscreen extent -48,-21 48,21, body extent -31,-17 31,17, height 18
Res0603 [mil]
  rect 30x35 smd: 1(-30,0) 2(30,0)
  silkscreen extent -48,-21 48,21, body extent -31,-17 31,17, height 18
Res-0201 [mm]
  rect 0.27x0.37 smd: 1(-0.275,0) 2(0.275,0)
  silkscreen extent -0.48,-0.25 0.48,0.25, body extent -0.3,-0.15 0.3,0.15, height 0.29
RES-2512 [mm]
  rect 1.6x3.4 smd: 1(-3.25,0) 2(3.25,0)
  silkscreen extent -4.24,-1.85 4.24,1.85, body extent -3.17,-1.63 3.18,1.63, height 0.58
SLF12575T-221M1R3-PF [mm]
  rect 2.6x3.2 smd: 1(-5.55,0) 2(5.55,0)
  silkscreen extent -7.48,-6.32 6.35,6.32, body extent -6.27,-6.33 6.33,6.27, height 7.5
SMA [mm]
  rect 2.5x1.7 smd: 1(-2,0) 2(2,0)
  silkscreen extent -4.45,-1.42 2.06,1.42, body extent -2.6,-1.3 2.6,1.3, height 2.4
SN74LVTH125PWR [mm]
  rect 1.55x0.35 smd: 1(-2.8,1.95) 2(-2.8,1.3) 3(-2.8,0.65) 4(-2.8,0) 5(-2.8,-0.65) 6(-2.8,-1.3) 7(-2.8,-1.95) 8(2.8,-1.95) 9(2.8,-1.3) 10(2.8,-0.65) 11(2.8,0) 12(2.8,0.65) 13(2.8,1.3) 14(2.8,1.95)
  silkscreen extent -3.16,-2.54 2.08,2.6, body extent -3.2,-2.5 3.2,2.5, height 1.2
SOD-123 [mm] "DIODE SCHOTTKY 100V 150MA SOD123"
  rect 0.97x0.65 smd: 1(-1.74,0) 2(1.74,0)
  silkscreen extent -3.25,-0.92 1.4,0.92, body extent -1.98,-0.85 1.98,0.85, height 1.44
SOIC-8 [mm]
  rect 1.55x0.6 smd: 1(-2.7,1.905) 2(-2.7,0.635) 3(-2.7,-0.635) 4(-2.7,-1.905) 5(2.7,-1.905) 6(2.7,-0.635) 7(2.7,0.635) 8(2.7,1.905)
  silkscreen extent -3.41,-2.51 1.68,2.7, body extent -3,-2.45 3,2.45, height 1.7
SOT-23 [mm] "TRANS NPN 40V 0.6A SOT23"
  rect 0.82x0.92 smd: 1(-0.95,-1) 2(0.95,-1) 3(0,1)
  silkscreen extent -1.82,-1.23 1.6,0.86, body extent -1.5,-1.25 1.5,1.25, height 1.05
SOT-23-6 [mm]
  rect 1.22x0.62 smd: 1(-1.31,0.95) 2(-1.31,0) 3(-1.31,-0.95) 4(1.31,-0.95) 5(1.31,0) 6(1.31,0.95)
  silkscreen extent -2.18,-1.52 0.86,1.52, body extent -1.5,-1.5 1.5,1.5, height 1.47
SOT-666 [mm]
  rect 0.99x0.3 smd: 1(-0.805,0.5) 2(-0.805,0) 3(-0.805,-0.5) 4(0.805,-0.5) 5(0.805,0) 6(0.805,0.5)
  silkscreen extent -1.57,-0.89 0.76,0.89, body extent -0.85,-0.85 0.85,0.85, height 0.64
"TACTILE SWITCH 13MM ACTUATOR" [mm]
  rect 2x1.5 smd: 1(-4.25,-2.25) 2(4.25,-2.25) 3(-4.25,2.25) 4(4.25,2.25)
  silkscreen extent -3.15,-3.07 3.15,3.07, body extent -4.73,-3 4.57,3, height 16.4
"TEST POINT" [mil]
  oct 60x60 smd: 1(0,0)
  silkscreen extent -37,-37 37,37
TPS60150DRVR [mm]
  rect 0.45x0.3 smd: 1(-0.975,0.65) 2(-0.975,0) 3(-0.975,-0.65) 4(0.975,-0.65) 5(0.975,0) 6(0.975,0.65)
  rect 1x1.6 smd: 7(0,0)
  silkscreen extent -1.14,-1.07 0.64,1.07, body extent -1,-1 1,1, height 0.78
TSOT-23-6 [mm]
  rect 1x0.6 smd: 1(-1.2,0.95) 2(-1.2,0) 3(-1.2,-0.95) 4(1.2,-0.95) 5(1.2,0) 6(1.2,0.95)
  silkscreen extent -1.98,-1.5 0.86,1.5, body extent -1.41,-1.45 1.41,1.45, height 1
X2-SON-3(0.6x1.3) [mm]
  rect 0.2x0.2 smd paste+0 mask+0.05: 1(-0.125,0) 2(0.125,-0.5) 3(0.125,0.5)
  silkscreen extent -0.66,-0.7 0.38,0.7, body extent -0.31,-0.65 0.31,0.65, height 0.4

## Part data
C1: library part EEEFT1H221AP, "CAP ALUM 220UF 20% 50V SMD", Case/Package=Radial, Dielectric Material=Aluminium, ESR (Equivalent Series Resistance)=180mR, LCSC Part Number=C178594, Leakage Current=110uA, Manufacturer=Panasonic, Max Operating Temperature=105°C, Min Operating Temperature=-55°C, Package Quantity=500, Ratings=AEC-Q200, Ripple Current=670mA, Supplier Part Number 1=31T8183, Tolerance=20%, Voltage=50V, Capacitance=220uF, Category="Aluminum Electrolytic Capacitors", ComponentLink1Description=https://datasheet.ciiva.com/11783/0900766b80f4973e-11783665.pdf?src-supplier=RSComponents, ComponentLink1URL=https://datasheet.ciiva.com/11783/0900766b80f4973e-11783665.pdf?src-supplier=RSComponents, ComponentLink2Description=https://datasheet.ciiva.com/48523/smd-ft-eng-tds-48523263.pdf?src-supplier=Distrelec, ComponentLink2URL=https://datasheet.ciiva.com/48523/smd-ft-eng-tds-48523263.pdf?src-supplier=Distrelec, ComponentLink3Description=https://datasheet.ciiva.com/43458/1790597-43458703.pdf?src-supplier=Farnell, ComponentLink3URL=https://datasheet.ciiva.com/43458/1790597-43458703.pdf?src-supplier=Farnell, ComponentLink4Description=https://datasheet.ciiva.com/6025/1790597-6025836.pdf?src-supplier=Farnell, ComponentLink4URL=https://datasheet.ciiva.com/6025/1790597-6025836.pdf?src-supplier=Farnell, ComponentLink5Description=https://datasheet.ciiva.com/46376/1790597-46376766.pdf?src-supplier=Element14, ComponentLink5URL=https://datasheet.ciiva.com/46376/1790597-46376766.pdf?src-supplier=Element14, ComponentLink6Description=https://datasheet.ciiva.com/28691/1244238-28691159.pdf?src-supplier=Element14, ComponentLink6URL=https://datasheet.ciiva.com/28691/1244238-28691159.pdf?src-supplier=Element14, ComponentLink7Description=https://datasheet.ciiva.com/28691/1244238-28691150.pdf?src-supplier=Element14, ComponentLink7URL=https://datasheet.ciiva.com/28691/1244238-28691150.pdf?src-supplier=Element14, ComponentLink8Description=https://datasheet.ciiva.com/46385/1790597-46385166.pdf?src-supplier=Element14, ComponentLink8URL=https://datasheet.ciiva.com/46385/1790597-46385166.pdf?src-supplier=Element14, ComponentLink9Description=https://datasheet.ciiva.com/24070/aba0000ce135-31031-24070059.pdf?src-supplier=Mouser, ComponentLink9URL=https://datasheet.ciiva.com/24070/aba0000ce135-31031-24070059.pdf?src-supplier=Mouser, ComponentLink10Description=https://datasheet.ciiva.com/14599/70243693-14599500.pdf?src-supplier=Allied+Electronics, ComponentLink10URL=https://datasheet.ciiva.com/14599/70243693-14599500.pdf?src-supplier=Allied+Electronics, ComponentLink11Description=https://datasheet.ciiva.com/14607/70243693-14607598.pdf?src-supplier=Allied+Electronics, ComponentLink11URL=https://datasheet.ciiva.com/14607/70243693-14607598.pdf?src-supplier=Allied+Electronics, ComponentLink12Description=https://datasheet.ciiva.com/14606/70243693-14606280.pdf?src-supplier=Allied+Electronics, ComponentLink12URL=https://datasheet.ciiva.com/14606/70243693-14606280.pdf?src-supplier=Allied+Electronics, ComponentLink13Description=https://datasheet.ciiva.com/10331/aba0000ce135-10331093.pdf?src-supplier=Avnet, ComponentLink13URL=https://datasheet.ciiva.com/10331/aba0000ce135-10331093.pdf?src-supplier=Avnet, ComponentLink14Description=https://datasheet.ciiva.com/30060/aba0000ce135-30060199.pdf?src-supplier=Onlinecomponents.com, ComponentLink14URL=https://datasheet.ciiva.com/30060/aba0000ce135-30060199.pdf?src-supplier=Onlinecomponents.com, Construction=Cylindrical, Contact Plating=Tin, Diameter=8mm, Height=10.2mm, Height - Seated (Max)=0.413inch, Item Type=Capacitor, Lead Diameter=0.9mm, Lead Free="Lead Free", Lead Pitch=3.1mm, Length=10.2mm, Life (Hours)=2000Hour, Manufacturer Part Number=EEEFT1H221AP, Mount="Surface Mount,PCB", Number of Pins=2, Packaging="Tape and Reel", Pricing 1="1=1.43000, 10=1.11000, 25=1.01000, 50=0.90500, 100=0.80400 (USD)", Radiation Hardening=No, Reach SVHC Compliant=Yes, Ripple Current (AC)=670mA, RoHS=Yes, RoHS Compliant=Yes, Series=FT, Stock 1=22638, Supplier 1=Avnet, Termination=SMD/SMT, Voltage Rating=50V, Voltage Rating (DC)=50V
C2 C13 C15 C20 C40 C51 C52 C53 C54 C55 C61: library part CL10B104KB8NNNC, "Cap Ceramic 0.1uF 50VDC X7R 10% SMD 0603 Paper T/R", Capacitance=100nF, Case Code (Imperial)=0603, Case Code (Metric)=1608, Dielectric=X7R, Manufacturer=Samsung, Max Operating Temperature=125°C, Min Operating Temperature=-55°C, Package Quantity=1, Supplier Part Number 1=1276-1000-1-ND, Tolerance=10%, Voltage=50V, Case/Package=0603, Category="Ceramic Capacitors", ComponentLink1Description=https://datasheet.ciiva.com/25803/cl10b104kb8nnnc-25803393.pdf?src-supplier=Digi-Key, ComponentLink1URL=https://datasheet.ciiva.com/25803/cl10b104kb8nnnc-25803393.pdf?src-supplier=Digi-Key, ComponentLink2Description=https://datasheet.ciiva.com/26838/getdatasheetpartid-89097-26838411.pdf?src-supplier=Verical, ComponentLink2URL=https://datasheet.ciiva.com/26838/getdatasheetpartid-89097-26838411.pdf?src-supplier=Verical, ComponentLink3Description=https://datasheet.ciiva.com/29198/456651-da-01-en-vs-kondensator-0605-29198839.pdf?src-supplier=Conrad, ComponentLink3URL=https://datasheet.ciiva.com/29198/456651-da-01-en-vs-kondensator-0605-29198839.pdf?src-supplier=Conrad, Construction=Flat, Contact Plating=Tin, Depth=0.8mm, Height=0.8mm, Lead Free="Lead Free", Length=1.6mm, Manufacturer Part Number=CL10B104KB8NNNC, Material=Ceramic, Mount="Surface Mount", Packaging="Tape and Reel", Pricing 1="1=0.10000, 10=0.03000, 50=0.01640, 100=0.01340, 500=0.00954, 1000=0.00750 (USD)", Radiation Hardening=No, RoHS=Yes, RoHS Compliant=Yes, Series=CL, Stock 1=3998791, Supplier 1=Digi-Key, Thickness=0.035inch, Voltage Rating=50V, Voltage Rating (DC)=50V, Width=0.031inch
C3 C46: library part CC0402KRX7R8BB103, "CAP CER 10000PF 25V X7R 0402", Case Code (Imperial)=0402, Case Code (Metric)=1005, Dielectric=X7R, Manufacturer=Yageo, Max Operating Temperature=125°C, Min Operating Temperature=-55°C, Package Quantity=1, Supplier Part Number 1=311-1337-1-ND, Tolerance=10%, Voltage Rating=25V, Capacitance=10nF, Case/Package=0402, ComponentLink1Description=http://www.yageo.com/documents/recent/UPY-GPHC_X7R_6.3V-to-50V_18.pdf?src-supplier=Digi-Key, ComponentLink1URL=http://www.yageo.com/documents/recent/UPY-GPHC_X7R_6.3V-to-50V_18.pdf?src-supplier=Digi-Key, ComponentLink2Description=https://www.verical.com/server-webapp/html/getDatasheet?partID=375418&src-supplier=Verical, ComponentLink2URL=https://www.verical.com/server-webapp/html/getDatasheet?partID=375418&src-supplier=Verical, ComponentLink3Description=http://www.yageo.com/documents/recent/UPY-GPHC_X7R_6.3V-to-50V_8.pdf?src-supplier=Avnet, ComponentLink3URL=http://www.yageo.com/documents/recent/UPY-GPHC_X7R_6.3V-to-50V_8.pdf?src-supplier=Avnet, ComponentLink4Description=https://4donline.ihs.com/images/VipMasterIC/IC/YAGO/YAGO-S-A0003557223/YAGO-S-A0003557223-1.pdf?hkey=52A5661711E402568146F3353EA87419&src-supplier=Element14, ComponentLink4URL=https://4donline.ihs.com/images/VipMasterIC/IC/YAGO/YAGO-S-A0003557223/YAGO-S-A0003557223-1.pdf?hkey=52A5661711E402568146F3353EA87419&src-supplier=Element14, ComponentLink5Description=http://www.farnell.com/datasheets/2167236.pdf?src-supplier=Element14, ComponentLink5URL=http://www.farnell.com/datasheets/2167236.pdf?src-supplier=Element14, ComponentLink6Description=http://www.mouser.com/ds/2/447/Yageo_UPY-GP_NP0_16V-to-50V_9-358835.pdf?src-supplier=Mouser, ComponentLink6URL=http://www.mouser.com/ds/2/447/Yageo_UPY-GP_NP0_16V-to-50V_9-358835.pdf?src-supplier=Mouser, Composition=Ceramic, Depth=0.5mm, Halogen Free="Halogen Free", Height=0.5mm, Lead Free="Lead Free", Length=1mm, Manufacturer Part Number=CC0402KRX7R8BB103, Mount="Surface Mount", Packaging="Tape and Reel", Pricing 1="1=0.1, 10=0.021, 100=0.0093, 500=0.00666, 1000=0.00523, 2500=0.00476, 5000=0.00438 (USD)", Radiation Hardening=No, REACH SVHC=Unknown, Stock 1=0, Supplier 1=Digi-Key, Termination=SMD/SMT, Thickness=0.022inch, Voltage Rating (DC)=25V, Width=0.02inch
C4: library part UMK105ABJ474KV-F, "CAP CER 0.47UF 50V X5R 0402", Capacitance=470nF, Case Code (Imperial)=0402, Case Code (Metric)=1005, Dielectric=X5R, Manufacturer="Taiyo Yuden", Max Operating Temperature=85°C, Min Operating Temperature=-55°C, Package Quantity=10000, Supplier Part Number 1=587-3497-1-ND, Tolerance=10%, Voltage Rating=50V, Case/Package=0402, Category="Ceramic Capacitors", ComponentLink1Description=https://datasheet.ciiva.com/30249/584umk105abj474kv-f-30249824.pdf?src-supplier=Onlinecomponents.com, ComponentLink1URL=https://datasheet.ciiva.com/30249/584umk105abj474kv-f-30249824.pdf?src-supplier=Onlinecomponents.com, ComponentLink2Description=https://datasheet.ciiva.com/24370/10umk105abj474kv-f-24370678.pdf?src-supplier=Onlinecomponents.com, ComponentLink2URL=https://datasheet.ciiva.com/24370/10umk105abj474kv-f-24370678.pdf?src-supplier=Onlinecomponents.com, ComponentLink3Description=https://datasheet.ciiva.com/18697/mlcc-all-e-18697429.pdf?src-supplier=Digi-Key, ComponentLink3URL=https://datasheet.ciiva.com/18697/mlcc-all-e-18697429.pdf?src-supplier=Digi-Key, ComponentLink4Description=https://datasheet.ciiva.com/18697/mlcc-all-e-18697430.pdf?src-supplier=Digi-Key, ComponentLink4URL=https://datasheet.ciiva.com/18697/mlcc-all-e-18697430.pdf?src-supplier=Digi-Key, ComponentLink5Description=https://datasheet.ciiva.com/18697/mlcc-all-e-18697431.pdf?src-supplier=Digi-Key, ComponentLink5URL=https://datasheet.ciiva.com/18697/mlcc-all-e-18697431.pdf?src-supplier=Digi-Key, Height=0.5mm, Lead Free="Lead Free", Length=0.039inch, Manufacturer Part Number=UMK105ABJ474KV-F, Mount="Surface Mount", Packaging="Tape and Reel", Pricing 1="1=0.24000, 10=0.16100, 50=0.09680, 100=0.08170, 500=0.05592, 1000=0.04946, 2500=0.04731, 5000=0.04301 (USD)", RoHS=Yes, RoHS Compliant=Yes, Stock 1=145003, Supplier 1=Digi-Key, Termination=SMD/SMT, Thickness=0.022inch, Voltage Rating (DC)=50V, Width=0.02inch
C5 C6 C14 C29 C34 C35: library part GRM188R6YA225KA12D, "CAP, 2.2µF, 35V, 10%, X5R, 0603", Case Code (Imperial)=0603, Case Code (Metric)=1608, Dielectric=X5R, Manufacturer=Murata, Max Operating Temperature=85°C, Min Operating Temperature=-55°C, Package Quantity=4000, Supplier Part Number 1=490-7204-1-ND, Tolerance=10%, Voltage=35V, Capacitance=2.2uF, Case/Package=0603, Category="Ceramic Capacitors", ComponentLink1Description=https://datasheet.ciiva.com/14906/partnumbering-e-01-14906490.pdf?src-supplier=Digi-Key, ComponentLink1URL=https://datasheet.ciiva.com/14906/partnumbering-e-01-14906490.pdf?src-supplier=Digi-Key, ComponentLink2Description=https://datasheet.ciiva.com/14906/partnumbering-e-01-14906491.pdf?src-supplier=Digi-Key, ComponentLink2URL=https://datasheet.ciiva.com/14906/partnumbering-e-01-14906491.pdf?src-supplier=Digi-Key, ComponentLink3Description=https://datasheet.ciiva.com/14906/partnumbering-e-01-14906492.pdf?src-supplier=Digi-Key, ComponentLink3URL=https://datasheet.ciiva.com/14906/partnumbering-e-01-14906492.pdf?src-supplier=Digi-Key, Depth=0.8mm, Height=0.8mm, Lead Free="Lead Free", Length=1.6mm, Manufacturer Part Number=GRM188R6YA225KA12D, Material=Ceramic, Mount="Surface Mount", Packaging="Tape and Reel", Pricing 1="1=0.21000, 10=0.14100, 50=0.08480, 100=0.07170, 500=0.04904, 1000=0.04338 (USD)", REACH SVHC="No SVHC", RoHS=Yes, RoHS Compliant=Yes, Series=GRM, Stock 1=81665, Supplier 1=Digi-Key, Termination=SMD/SMT, Thickness=0.035inch, Voltage Rating=35V, Voltage Rating (DC)=35V, Weight=0.000222oz, Width=0.8mm
C7: library part CC0603KRX5R8BB105, "CAP CER 1UF 25V X5R 0603", Case Code (Imperial)=0603, Case Code (Metric)=1608, Dielectric=X5R, Manufacturer=Yageo, Max Operating Temperature=85°C, Min Operating Temperature=-55°C, Package Quantity=1, Supplier Part Number 1=311-1445-1-ND, Tolerance=10%, Voltage Rating=25V, Capacitance=1uF, Case/Package=0603, Category="Ceramic Capacitors", ComponentLink1Description=https://datasheet.ciiva.com/176/mlccorderingcode-176785.pdf?src-supplier=Digi-Key, ComponentLink1URL=https://datasheet.ciiva.com/176/mlccorderingcode-176785.pdf?src-supplier=Digi-Key, ComponentLink2Description=https://datasheet.ciiva.com/176/mlccorderingcode-176786.pdf?src-supplier=Digi-Key, ComponentLink2URL=https://datasheet.ciiva.com/176/mlccorderingcode-176786.pdf?src-supplier=Digi-Key, ComponentLink3Description=https://datasheet.ciiva.com/176/mlccorderingcode-176787.pdf?src-supplier=Digi-Key, ComponentLink3URL=https://datasheet.ciiva.com/176/mlccorderingcode-176787.pdf?src-supplier=Digi-Key, ComponentLink4Description=https://datasheet.ciiva.com/17436/upy-gphc-x5r-4v-to-50v-12-17436952.pdf?src-supplier=Avnet+Europe, ComponentLink4URL=https://datasheet.ciiva.com/17436/upy-gphc-x5r-4v-to-50v-12-17436952.pdf?src-supplier=Avnet+Europe, ComponentLink5Description=https://datasheet.ciiva.com/7978/1525783-7978171.pdf?src-supplier=Element14, ComponentLink5URL=https://datasheet.ciiva.com/7978/1525783-7978171.pdf?src-supplier=Element14, ComponentLink6Description=https://datasheet.ciiva.com/11586/upy-gphc-x5r-4v-to-50v-12-11586318.pdf?src-supplier=Avnet, ComponentLink6URL=https://datasheet.ciiva.com/11586/upy-gphc-x5r-4v-to-50v-12-11586318.pdf?src-supplier=Avnet, Construction=Flat, Depth=0.8mm, Halogen Free="Halogen Free", Height=0.8mm, Lead Free="Lead Free", Length=1.6mm, Manufacturer Part Number=CC0603KRX5R8BB105, Mount="Surface Mount", Number of Pins=2, Packaging="Tape and Reel", Pricing 1="1=0.12000, 10=0.08400, 50=0.04760, 100=0.03940, 500=0.02764, 1000=0.02288 (USD)", Radiation Hardening=No, REACH SVHC="No SVHC", RoHS=Yes, RoHS Compliant=Yes, Series=CC, Stock 1=919939, Supplier 1=Digi-Key, Termination=SMD/SMT, Thickness=0.035inch, Voltage Rating (DC)=25V, Width=0.031inch
C8 C10 C11 C12: library part GRM188R6YA106MA73D, "10uF 35V X5R 20% Pad SMD 0603", Case Code (Imperial)=0603, Case Code (Metric)=1608, Dielectric=X5R, Manufacturer=Murata, Max Operating Temperature=85°C, Min Operating Temperature=-55°C, Tolerance=20%, Voltage Rating=35V, Capacitance=10uF, Case/Package=0603, Category="Ceramic Capacitors", ComponentLink1Description=http://search.murata.co.jp/Ceramy/image/img/A01X/G101/ENG/GRM188R6YA106MA73-01.pdf?src-supplier=Future+Electronics, ComponentLink1URL=http://search.murata.co.jp/Ceramy/image/img/A01X/G101/ENG/GRM188R6YA106MA73-01.pdf?src-supplier=Future+Electronics, ComponentLink2Description=http://search.murata.co.jp/Ceramy/image/img/A01X/G101/ENG/GRM188R6YA106MA73-01.pdf?src-supplier=Digi-Key, ComponentLink2URL=http://search.murata.co.jp/Ceramy/image/img/A01X/G101/ENG/GRM188R6YA106MA73-01.pdf?src-supplier=Digi-Key, ComponentLink3Description=https://www.murata.com/~/media/webrenewal/support/library/catalog/products/capacitor/mlcc/c02e.ashx?la=en-us&src-supplier=Digi-Key, ComponentLink3URL=https://www.murata.com/~/media/webrenewal/support/library/catalog/products/capacitor/mlcc/c02e.ashx?la=en-us&src-supplier=Digi-Key, ComponentLink4Description=http://search.murata.co.jp/Ceramy/image/img/A01X/G101/ENG/GRM188R6YA106MA73-01.pdf?src-supplier=Mouser, ComponentLink4URL=http://search.murata.co.jp/Ceramy/image/img/A01X/G101/ENG/GRM188R6YA106MA73-01.pdf?src-supplier=Mouser, ComponentLink5Description=http://search.murata.co.jp/Ceramy/image/img/A01X/G101/ENG/GRM188R6YA106MA73-01.pdf?src-supplier=TTI, ComponentLink5URL=http://search.murata.co.jp/Ceramy/image/img/A01X/G101/ENG/GRM188R6YA106MA73-01.pdf?src-supplier=TTI, Length=0.063inch, Manufacturer Part Number=GRM188R6YA106MA73D, Mount="Surface Mount", Packaging="Tape and Reel", Pricing 1="1=0.36650, 10=0.23380, 25=0.23160, 100=0.15050, 250=0.14890, 500=0.10700, 1000=0.09270, 3000=0.08640, 6000=0.07720, 15000=0.07140, 30000=0.05840 (USD)", RoHS=Yes, RoHS Compliant=Yes, Stock 1=37601, Supplier 1="Arrow Electronics", Supplier Part Number 1=GRM188R6YA106MA73D, Thickness=0.039inch, Voltage Rating (DC)=35V, Width=0.031inch
C9: library part CC0603KRX7R9BB823, "CAP CER 0.082UF 50V X7R 0603", Case Code (Imperial)=0603, Case Code (Metric)=1608, Dielectric=X7R, Manufacturer=Yageo, Max Operating Temperature=125°C, Min Operating Temperature=-55°C, Resistor Type=Ceramic, Supplier Part Number 1=69AH7269, Tolerance=10%, Voltage Rating=50V, Capacitance=82nF, Case/Package=0603, Category="Ceramic Capacitors", ComponentLink1Description=https://datasheet.ciiva.com/13264/upy-gphc-x7r-6-3v-to-50v-8-12304-13264057.pdf?src-supplier=Mouser, ComponentLink1URL=https://datasheet.ciiva.com/13264/upy-gphc-x7r-6-3v-to-50v-8-12304-13264057.pdf?src-supplier=Mouser, Depth=0.8mm, Halogen Free="Halogen Free", Lead Free="Lead Free", Length=1.6mm, Manufacturer Part Number=CC0603KRX7R9BB823, Mount="Surface Mount", Packaging="Tape and Reel", Pricing 1="1=0.01500, 4000=0.01400, 8000=0.01400 (USD)", Radiation Hardening=No, RoHS=Yes, RoHS Compliant=Yes, Series=CC, Stock 1=40000, Supplier 1=Newark, Termination=SMD/SMT, Thickness=0.035inch, Voltage Rating (DC)=50V, Weight=7.1E-05oz, Width=0.031inch
C16 C18 C19 C21: library part 08051C224K4T2A, "Cap Ceramic 0.22uF 100V X7R 10% SMD 0805 125°C Embossed T/R", Case/Package=0805, Dielectric=X7R, Manufacturer="Kyocera AVX", Max Operating Temperature=125°C, Min Operating Temperature=-55°C, Supplier Part Number 1=478-13049-1-ND, Tolerance=10%, Voltage Rating (DC)=100V, Capacitance=220nF, Category="Ceramic Capacitors", ComponentLink1Description=http://datasheets.avx.com/AutoMLCC.pdf?src-supplier=Avnet+Asia, ComponentLink1URL=http://datasheets.avx.com/AutoMLCC.pdf?src-supplier=Avnet+Asia, Contact Plating=Tin, Length=2.01mm, Manufacturer Part Number=08051C224K4T2A, Mount="Surface Mount", Pricing 1="1=0.27000, 10=0.18500, 50=0.12320, 100=0.10470, 500=0.07392, 1000=0.06468 (USD)", RoHS=Yes, RoHS Compliant=Yes, Stock 1=151, Supplier 1=Digi-Key, Termination=Wraparound
C17: library part CGA3E2X7R2A223K080AA, "0603 .022uF 100volts X7R 10% T=0.8mm", Case Code (Imperial)=0603, Case Code (Metric)=1608, Dielectric=X7R, Manufacturer=TDK, Max Operating Temperature=125°C, Min Operating Temperature=-55°C, Package Quantity=1, Ratings=AEC-Q200, Resistor Type=Ceramic, Supplier Part Number 1=445-5814-1-ND, Tolerance=10%, Voltage Rating=100V, Capacitance=22nF, Case/Package=0603, Category="Ceramic Capacitors", ComponentLink1Description=https://datasheet.ciiva.com/22725/1735406-22725648.pdf?src-supplier=Element14, ComponentLink1URL=https://datasheet.ciiva.com/22725/1735406-22725648.pdf?src-supplier=Element14, ComponentLink2Description=https://datasheet.ciiva.com/24218/cga3e2x7r2a223k080aa-266292-24218959.pdf?src-supplier=Mouser, ComponentLink2URL=https://datasheet.ciiva.com/24218/cga3e2x7r2a223k080aa-266292-24218959.pdf?src-supplier=Mouser, ComponentLink3Description=https://datasheet.ciiva.com/7975/1807242-7975349.pdf?src-supplier=Element14, ComponentLink3URL=https://datasheet.ciiva.com/7975/1807242-7975349.pdf?src-supplier=Element14, Depth=0.8mm, Height=0.8mm, Length=1.6mm, Manufacturer Part Number=CGA3E2X7R2A223K080AA, Mount="Surface Mount", Packaging="Tape and Reel", Pricing 1="1=0.11000, 10=0.07600, 50=0.04340, 100=0.03590, 500=0.02516, 1000=0.02083 (USD)", REACH SVHC="No SVHC", RoHS=Yes, RoHS Compliant=Yes, Series=CGA, Stock 1=56079, Supplier 1=Digi-Key, Termination=SMD/SMT, Thickness=0.035inch, Voltage Rating (DC)=100V, Weight=7.1E-05oz, Width=0.031inch
C22: library part 189RV0038, "220uF 63V 225mA@100KHz ±20% SMD,D10xL10.5mm Aluminum Electrolytic Capacitors - SMD ROHS", LCSC Part Number=C7471900, Manufacturer=KNSCHA, Package=SMD,D10xL10.5mm, ComponentLink1Description=LCSC, ComponentLink1URL=https://www.lcsc.com/product-detail/Aluminum-Electrolytic-Capacitors-SMD_KNSCHA-189RV0038_C7471900.html, Item Type=Capacitor, Manufacturer Part Number=189RV0038
C23 C24: library part CC0603KRX7R9BB222, "CAP CER 2200PF 50V X7R 0603", Case Code (Imperial)=0603, Case Code (Metric)=1608, Dielectric=X7R, Insulation Resistance=10GR, LCSC Part Number=C107082, Manufacturer=Yageo, Max Operating Temperature=125°C, Min Operating Temperature=-55°C, Package Quantity=1, Resistor Type=Ceramic, Supplier Part Number 1=6169509, Tolerance=10%, Voltage=50V, Capacitance=2.2nF, Case/Package=0603, Category="Ceramic Capacitors", ComponentLink1Description=https://datasheet.ciiva.com/23768/1079489-23768004.pdf?src-supplier=Newark, ComponentLink1URL=https://datasheet.ciiva.com/23768/1079489-23768004.pdf?src-supplier=Newark, ComponentLink2Description=https://datasheet.ciiva.com/11788/0900766b8079c870-11788403.pdf?src-supplier=RSComponents, ComponentLink2URL=https://datasheet.ciiva.com/11788/0900766b8079c870-11788403.pdf?src-supplier=RSComponents, ComponentLink3Description=https://datasheet.ciiva.com/26862/getdatasheetpartid-403587-26862854.pdf?src-supplier=Verical, ComponentLink3URL=https://datasheet.ciiva.com/26862/getdatasheetpartid-403587-26862854.pdf?src-supplier=Verical, ComponentLink4Description=https://datasheet.ciiva.com/8033/70765-8033863.pdf?src-supplier=Element14, ComponentLink4URL=https://datasheet.ciiva.com/8033/70765-8033863.pdf?src-supplier=Element14, ComponentLink5Description=https://datasheet.ciiva.com/7978/1489800-7978172.pdf?src-supplier=Element14, ComponentLink5URL=https://datasheet.ciiva.com/7978/1489800-7978172.pdf?src-supplier=Element14, ComponentLink6Description=https://datasheet.ciiva.com/28450/1489800-28450632.pdf?src-supplier=Element14, ComponentLink6URL=https://datasheet.ciiva.com/28450/1489800-28450632.pdf?src-supplier=Element14, ComponentLink7Description=https://datasheet.ciiva.com/155/mlccorderingcode-155921.pdf?src-supplier=Digi-Key, ComponentLink7URL=https://datasheet.ciiva.com/155/mlccorderingcode-155921.pdf?src-supplier=Digi-Key, ComponentLink8Description=https://datasheet.ciiva.com/155/mlccorderingcode-155920.pdf?src-supplier=Digi-Key, ComponentLink8URL=https://datasheet.ciiva.com/155/mlccorderingcode-155920.pdf?src-supplier=Digi-Key, ComponentLink9Description=https://datasheet.ciiva.com/155/mlccorderingcode-155922.pdf?src-supplier=Digi-Key, ComponentLink9URL=https://datasheet.ciiva.com/155/mlccorderingcode-155922.pdf?src-supplier=Digi-Key, ComponentLink10Description=https://datasheet.ciiva.com/8033/1489800-8033864.pdf?src-supplier=Element14, ComponentLink10URL=https://datasheet.ciiva.com/8033/1489800-8033864.pdf?src-supplier=Element14, ComponentLink11Description=https://datasheet.ciiva.com/8033/1489800-8033862.pdf?src-supplier=Element14, ComponentLink11URL=https://datasheet.ciiva.com/8033/1489800-8033862.pdf?src-supplier=Element14, ComponentLink12Description=https://datasheet.ciiva.com/16625/upy-gphc-x7r-6-3v-to-50v-8-16625531.pdf?src-supplier=Avnet+Europe, ComponentLink12URL=https://datasheet.ciiva.com/16625/upy-gphc-x7r-6-3v-to-50v-8-16625531.pdf?src-supplier=Avnet+Europe, Depth=0.8mm, Dissipation Factor=2.5%, Halogen Free="Halogen Free", Height=0.8mm, Lead Free="Lead Free", Length=1.6mm, Manufacturer Part Number=CC0603KRX7R9BB222, Mount="Surface Mount", Number of Pins=2, Packaging="Tape and Reel", Pricing 1="4000=0.00500 (USD)", Radiation Hardening=No, REACH SVHC="No SVHC", RoHS=Yes, RoHS Compliant=Yes, Series=CC, Stock 1=1, Supplier 1=RSComponents, Termination=SMD/SMT, Thickness=0.035inch, Voltage Rating=50V, Voltage Rating (DC)=50V, Width=0.031inch
C26 C27 C28 C31: library part 08051C224K4T2A, "CAP CER 0.22UF 100V X7R 0805", Case/Package=0805, Dielectric=X7R, Manufacturer="Kyocera AVX", Max Operating Temperature=125°C, Min Operating Temperature=-55°C, Supplier Part Number 1=478-13049-1-ND, Tolerance=10%, Voltage Rating (DC)=100V, Capacitance=220nF, Category="Ceramic Capacitors", ComponentLink1Description=http://datasheets.avx.com/AutoMLCC.pdf?src-supplier=Avnet+Asia, ComponentLink1URL=http://datasheets.avx.com/AutoMLCC.pdf?src-supplier=Avnet+Asia, Contact Plating=Tin, Length=2.01mm, Manufacturer Part Number=08051C224K4T2A, Mount="Surface Mount", Pricing 1="1=0.27000, 10=0.18500, 50=0.12320, 100=0.10470, 500=0.07392, 1000=0.06468 (USD)", RoHS=Yes, RoHS Compliant=Yes, Stock 1=151, Supplier 1=Digi-Key, Termination=Wraparound